# Altium PCB SBH_Charger.PcbDoc (part 1 of 3)
Units mil, origin at the board's own origin, x right, y up, seen from the top; angles counter-clockwise.
Board outline 4700 x 3200 mil, 4 copper layers (Top Layer, Mid Layer 1, Mid Layer 2, Bottom Layer), stack 61.811 mil thick; 160 components, 116 nets, 654 pads, 375 vias.
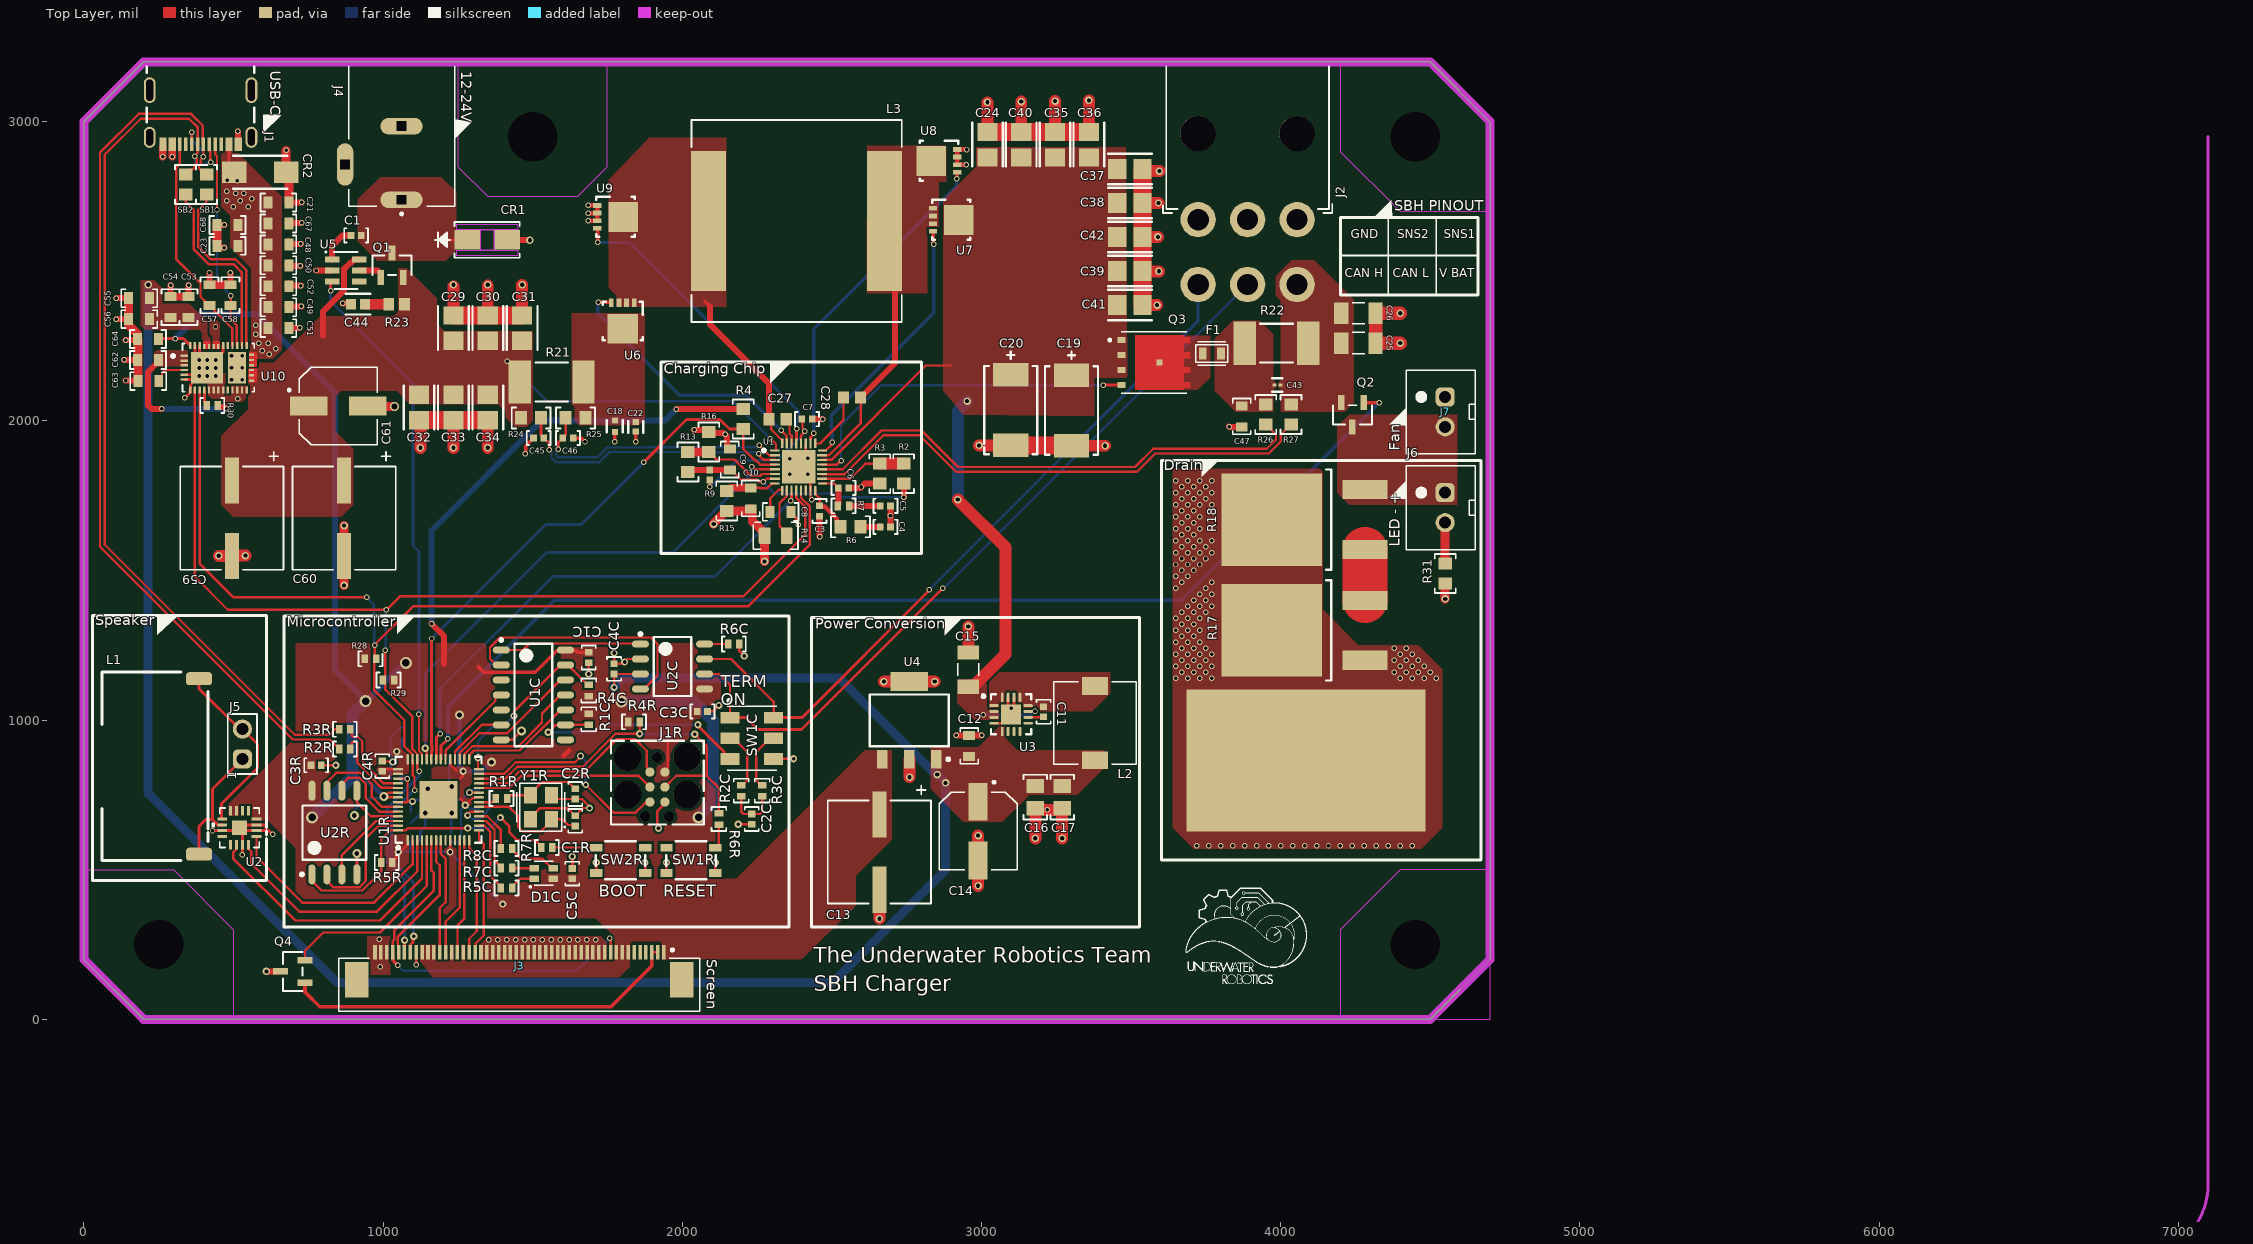
[diagram p0: Top Layer view]
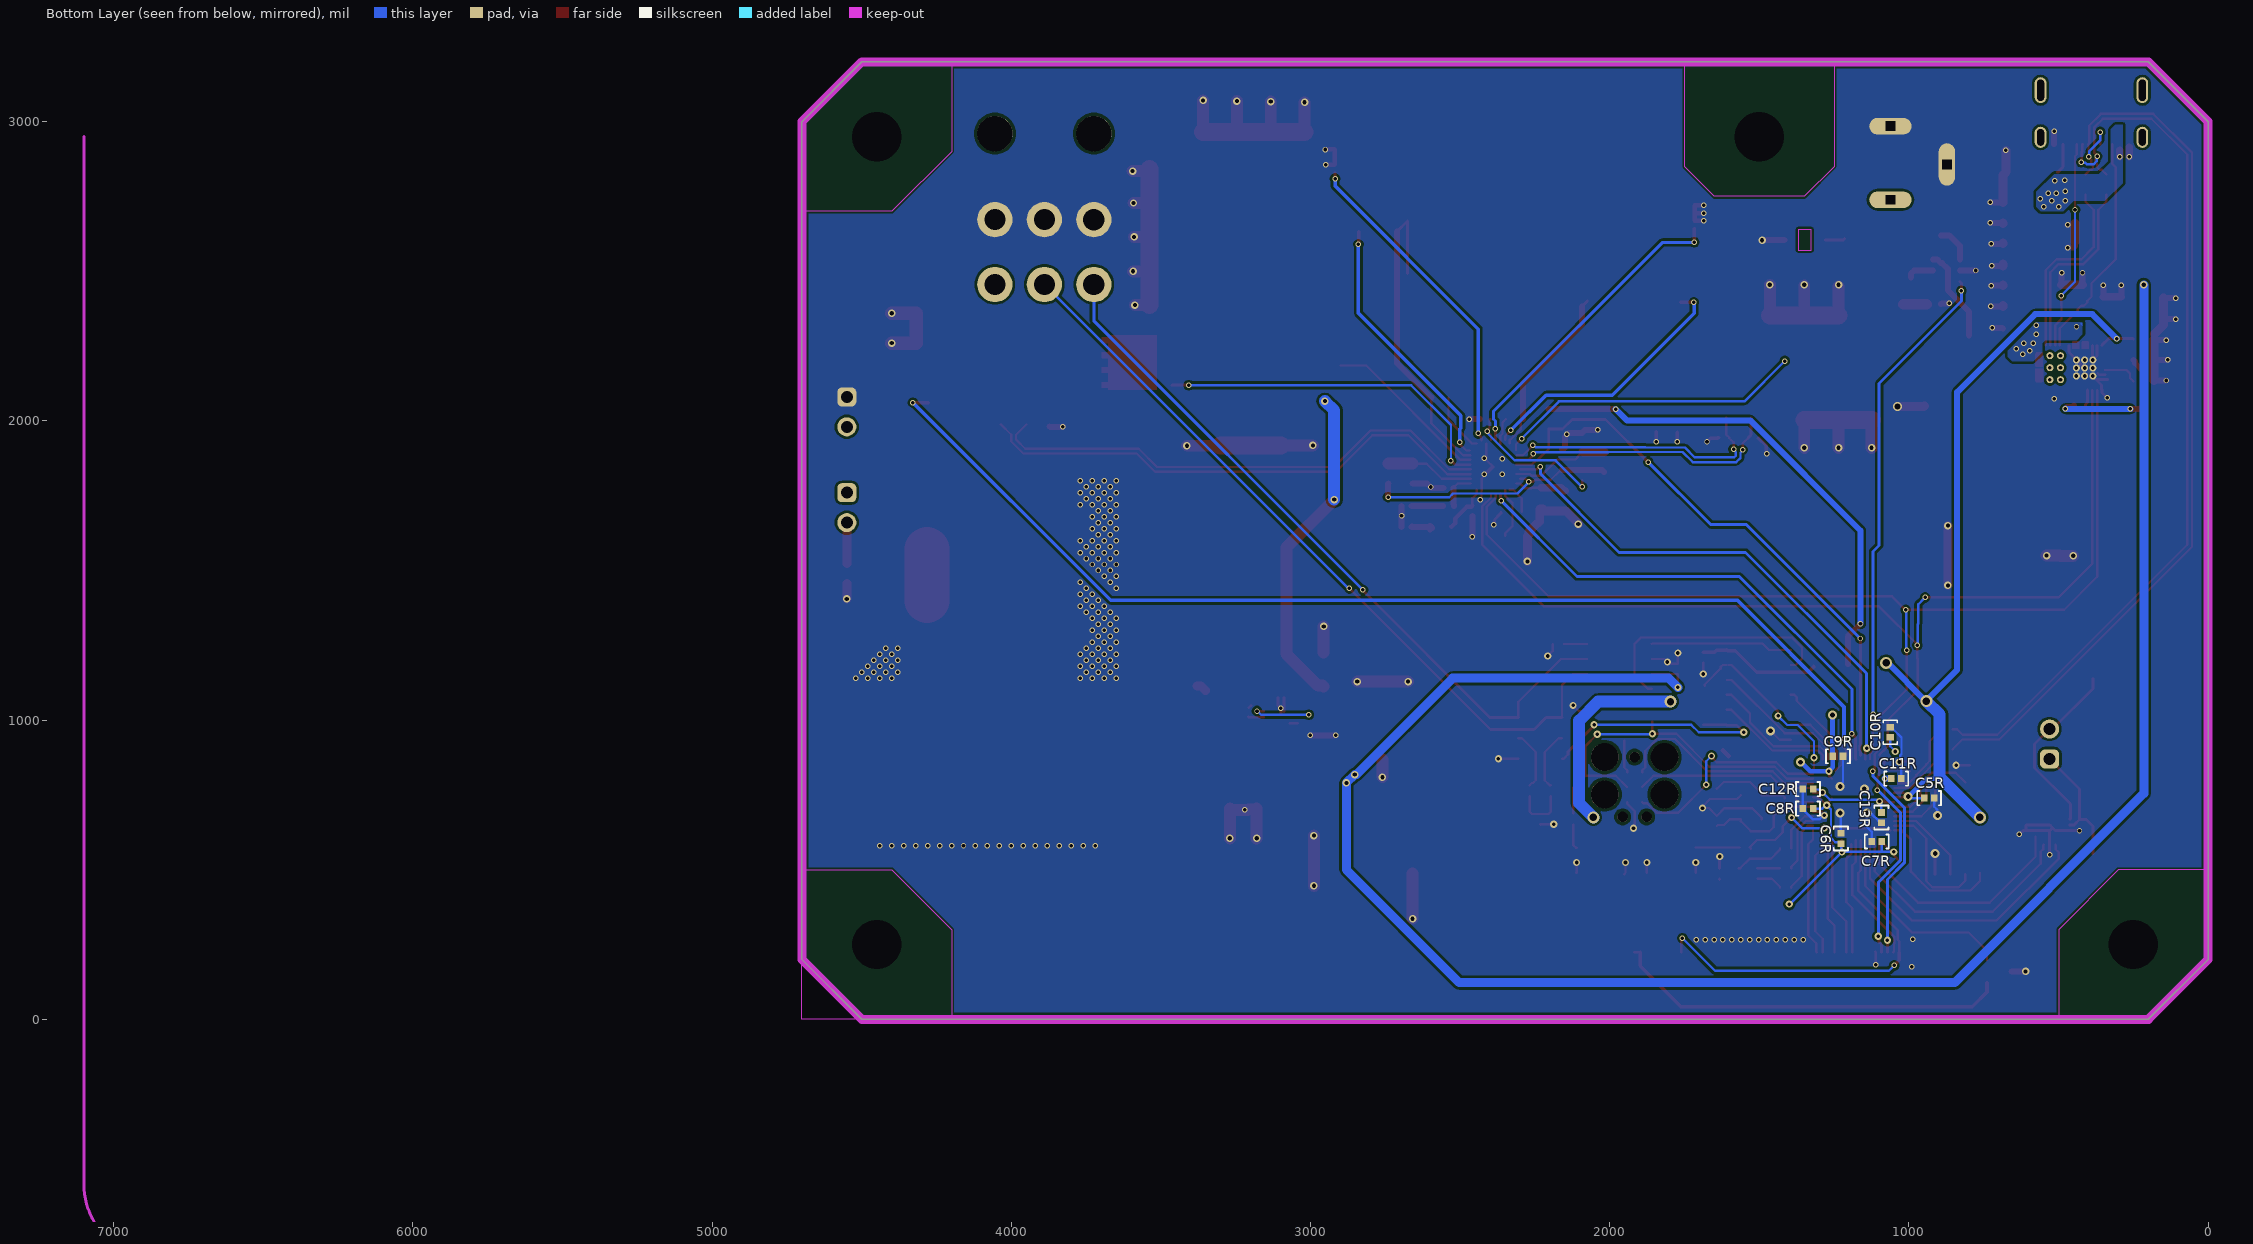
[diagram p1: Bottom Layer view, seen from below]
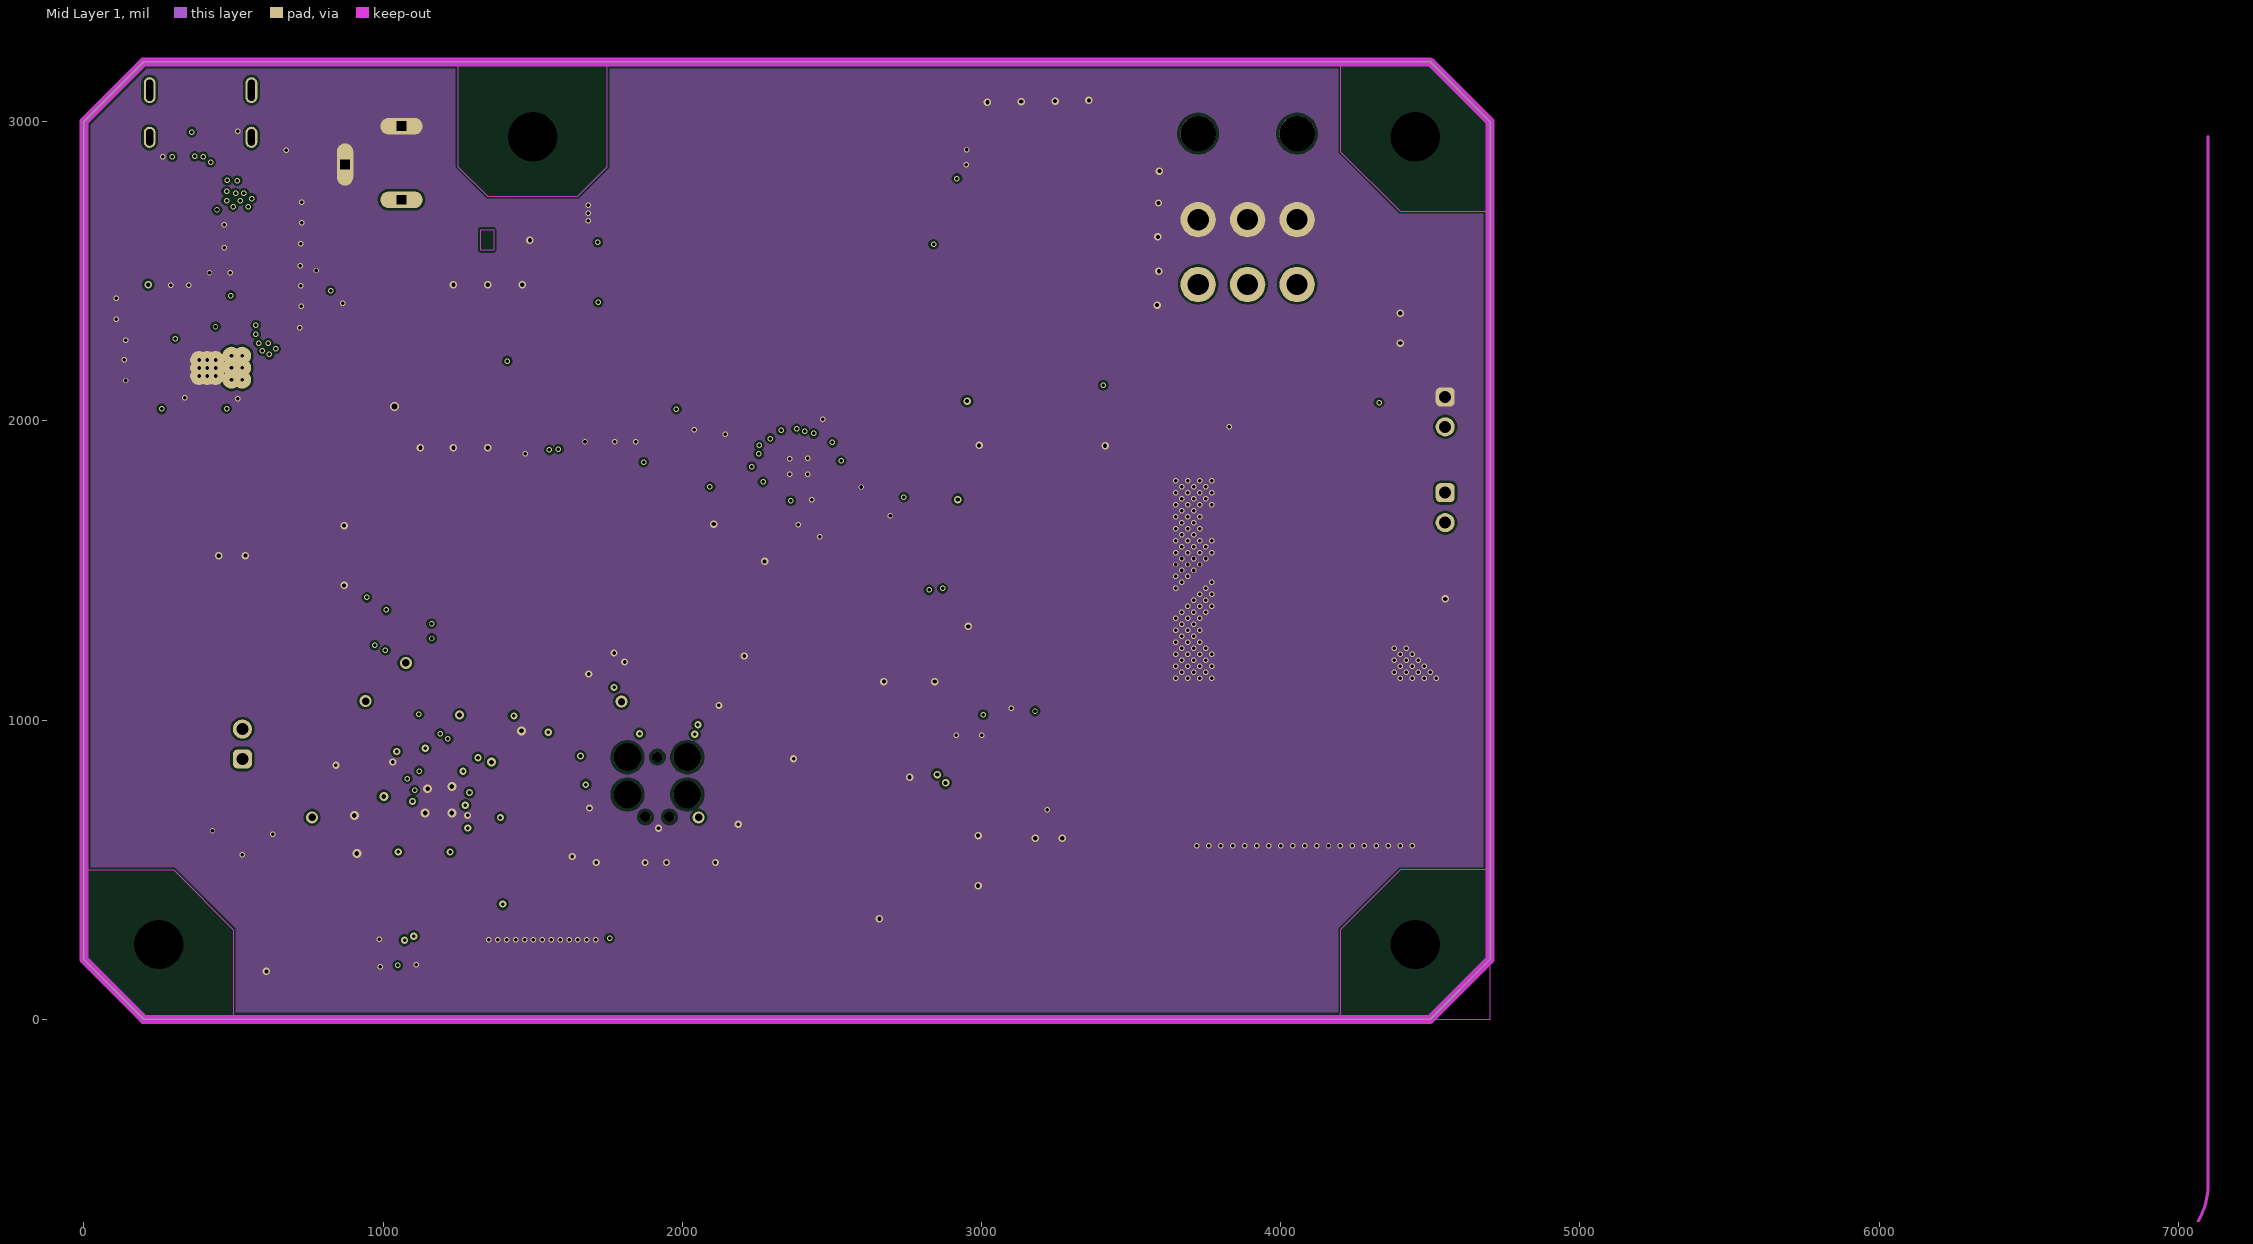
[diagram p2: Mid Layer 1]
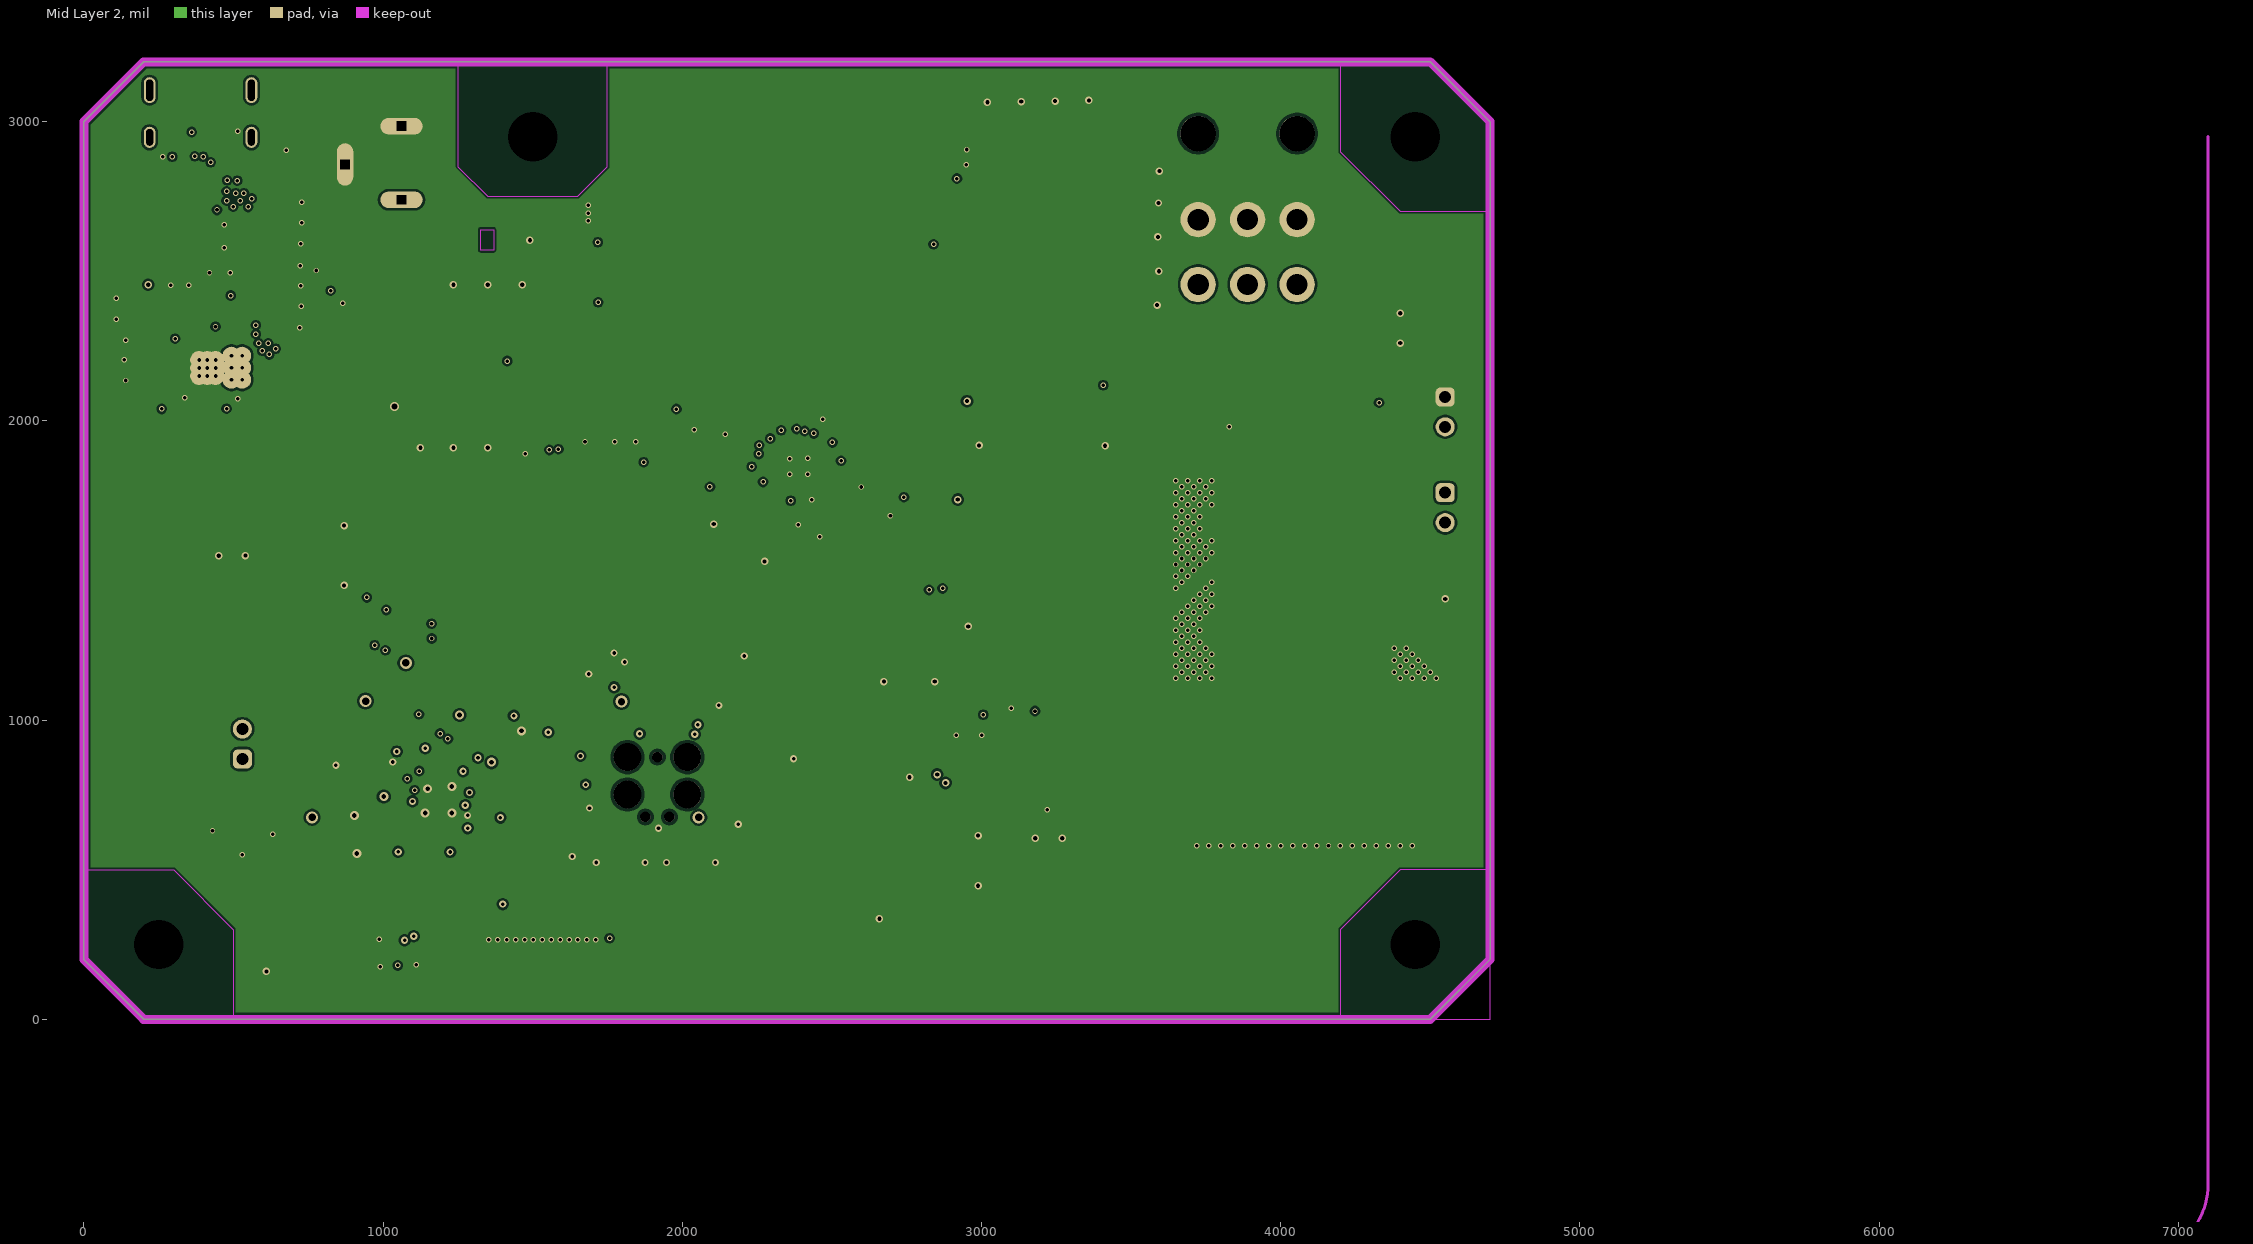
[diagram p3: Mid Layer 2]
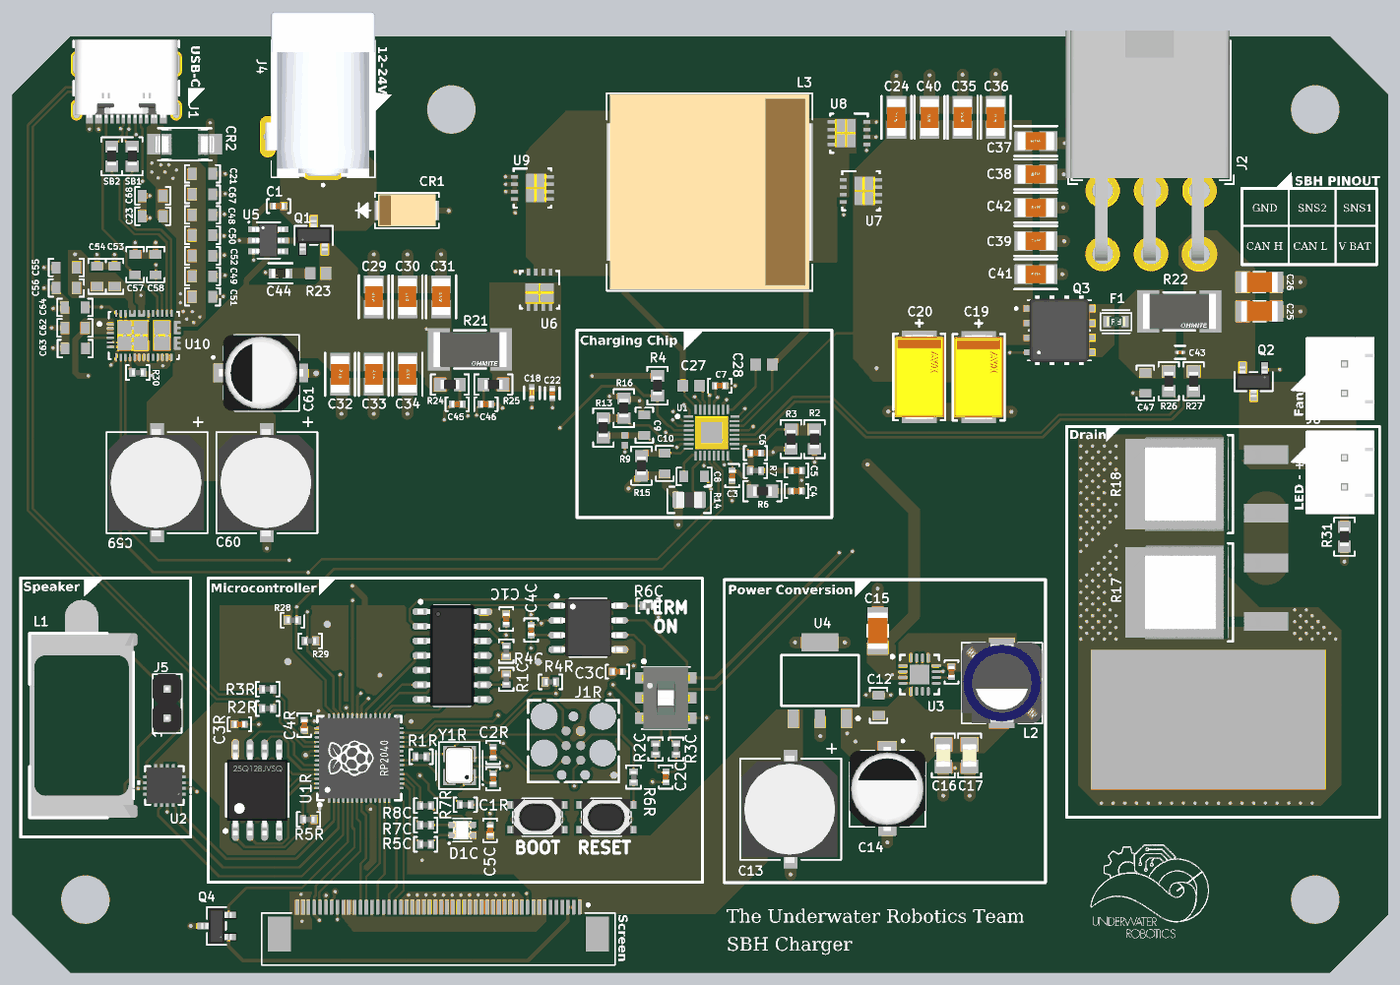
[diagram p5: 3D render of the assembled board from above, using the file's embedded part models]
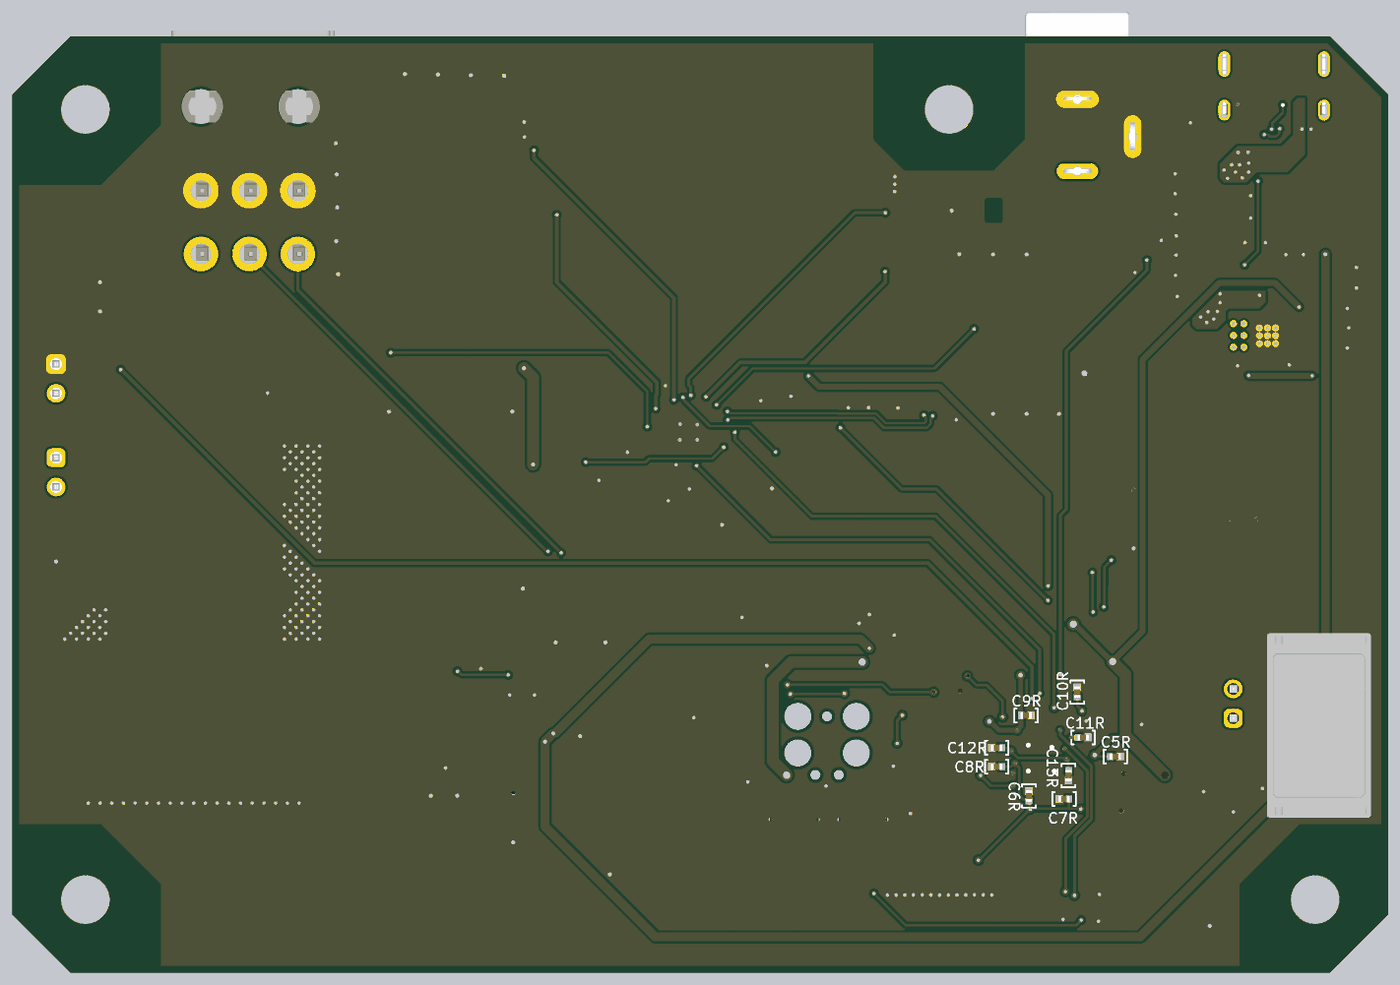
[diagram p6: 3D render of the assembled board from below, using the file's embedded part models]

## Layer stack, top to bottom
Top Solder: solder mask 0.5, Solder Resist, Dk 3.8
Top Layer: signal copper 1.378
Dielectric 1: prepreg 7.874, 7628, Dk 4.6
Mid Layer 1: signal copper 0.689
Core: core 41.929, FR-4, Dk 4.5
Mid Layer 2: signal copper 0.689
Dielectric 2: prepreg 7.874, 7628, Dk 4.6
Bottom Layer: signal copper 1.378
Bottom Solder: solder mask 0.5, Solder Resist, Dk 3.8

## Board outline
4500,3200 4700,3000 4700,200 4500,0 200,0 0,200 0,3000 200,3200

## Design rules (kind name [scope] priority, off if disabled: settings)
AcuteAngle [All] p1: minimum=8.00000000000000E+0001 checktracksonly=FALSE
BoardOutlineClearance "BoardOutlineClearance JLCPCB" [All] p1: gap=11.81 ignorepadtopadclearanceinfootprint=FALSE
Clearance "Clearance JLCPCB 4 layer" [All] p1: gap=7.87 ignorepadtopadclearanceinfootprint=FALSE except(3.54: Arc-Arc Arc-Track Track-Track; 5: Arc-SMDPad Arc-Via Track-SMDPad Track-Via SMDPad-SMDPad; 9.45: THPad-THPad THPad-Via Via-Via; 10: Arc-Hole Track-Hole SMDPad-Hole THPad-Hole Via-Hole Fill-Hole Poly-Hole Region-Hole Text-Hole)
DiffPairsRouting "Diff Pairs USB 2.0" [InDifferentialPairClass('USB 2.0')] p1: maxlimit=5 minlimit=5 mostfreqgap=5 toplayer_minwidth=7.87 toplayer_maxwidth=7.87 toplayer_prefwidth=7.87 midlayer1_minwidth=15 midlayer1_maxwidth=15 midlayer1_prefwidth=15 midlayer2_minwidth=15 midlayer2_maxwidth=15 midlayer2_prefwidth=15 bottomlayer_minwidth=7.87 bottomlayer_maxwidth=7.87 bottomlayer_prefwidth=7.87 impedanceprofiledriven=TRUE impedanceprofileid={9C1C01C3-81FD-4AE1-9E3D-BC841176F5CA} maxuncoupledlength=500
DiffPairsRouting "Diff Pairs PCIe Gen 2" [InDifferentialPairClass('PCIe Gen 2')] p2: maxlimit=5 minlimit=5 mostfreqgap=5 toplayer_minwidth=5.53 toplayer_maxwidth=5.53 toplayer_prefwidth=5.53 midlayer1_minwidth=15 midlayer1_maxwidth=15 midlayer1_prefwidth=15 midlayer2_minwidth=15 midlayer2_maxwidth=15 midlayer2_prefwidth=15 bottomlayer_minwidth=5.53 bottomlayer_maxwidth=5.53 bottomlayer_prefwidth=5.53 impedanceprofiledriven=TRUE impedanceprofileid={D86E5A41-F98B-413D-93FD-A6E48D035561} maxuncoupledlength=500
HoleSize "HoleSize JLCPCB Pad" [IsPad] p1: absolutevalues=TRUE maxlimit=248.03 minlimit=19.68 maxpercent=80.000 minpercent=20.000
HoleSize "HoleSize JLCPCB 4 layer Cheap" [All] p2: absolutevalues=TRUE maxlimit=248.03 minlimit=11.81 maxpercent=80.000 minpercent=20.000
HoleToHoleClearance "HoleToHoleClearance JLCPCB Same Net" [All] p1: gap=10 allowstackedmicrovias=TRUE
MinimumAnnularRing "MinimumAnnularRing JLCPCB Via" [All] p1: minimumring=2.95
MinimumAnnularRing "MinimumAnnularRing JLCPCB Pad" [IsPad] p2: minimumring=9.84
MinimumAnnularRing "MinimumAnnularRing JLCPCB 1oz" [All] p3: minimumring=5.12
MinimumSolderMaskSliver "MinimumSolderMaskSliver JLCPCB" [All] p1: minsoldermaskwidth=3.94
PlaneClearance [All] p1: clearance=11.81
PlaneConnect [All] p1: planeconnectstyle=Direct reliefexpansion=20 reliefentries=4 reliefconductorwidth=10 reliefairgap=10
PolygonConnect [All] p1: connectstyle=Direct reliefconductorwidth=15 reliefentries=4 polygonreliefangle="45 Angle" airgapwidth=10
RoutingVias "RoutingVias JLCPCB 4 layer" [All] p1: holewidth=19.68 width=39.37 viastyle="Through Hole" minholewidth=11.81 minwidth=17.72 maxholewidth=50 maxwidth=80 useviatemplates=TRUE
SilkToSilkClearance [All] p1: silktosilkclearance=3
SilkToSolderMaskClearance "SilkToSolderMaskClearance JLCPCB" [IsPad] p1: minsilkscreentomaskgap=5.91 clearancetoexposedcopper=TRUE
SolderMaskExpansion "SolderMaskExpansion JLCPCB" [All] p1: expansion=1.5 istentingtop=FALSE
UnRoutedNet [All] p1: checkbadconnections=TRUE
Width "Width JLCPCB 4 layer" [All] p1: maxlimit=196.85 minlimit=3.54 preferedwidth=9.84 minimp=50.000000 maximp=50.000000 favimp=50.000000
21 further rules are at their usual default settings.

## Classes and differential pairs
differential pair class "USB 2.0": USB USB_RP2040
component class U_RP2040_with_CAN: C1C C2C C3C C4C C5C D1C R1C R2C R3C R4C R5C R6C R7C R8C SW1C U1C U2C
component class U_RP2040_C: C1R C2R C3R C4R C5R C6R C7R C8R C9R C10R C11R C12R C13R J1R R1R R2R R3R R4R R5R R6R R7R SW1R SW2R U1R U2R Y1R
component class SBH_Charger_Connectors: C21 C23 C67 C68 J1 J2 J3 J4 J6 J7 R31 SB1 SB2
component class Designator: C48 C49 C50 C51 C52 C53 C54 C55 C56 C57 C58 C59 C60 C61 C62 C63 C64 CR2 R30 U10
differential pair D: +D_P -D_N
differential pair SR: +SR_P -SR_N
differential pair AC: +AC_P -AC_N
differential pair USB: +USB_P -USB_N
differential pair USB_RP2040: +USB_RP2040_P -USB_RP2040_N

## Components (designator, comment, footprint, x,y, rotation, side; value= is the part's Value field where it differs from the comment)
C1 "CC0402KRX7R9BB103" CAPACITOR_0402 910,2620 r180 top value="10 nF"
C1C "100nF Ceramic 25V" CAPACITOR_0402 1687.41,1209.12 r270 top value=0.1uF
C1R "27pF Ceramic 50V" CAPACITOR_0402 1642.41,663.23 r90 top value=27pF
C2C "4700pF Ceramic 25V" CAPACITOR_0402 2232.41,669.12 r90 top value=4.7nF
C2R "27pF Ceramic 50V" CAPACITOR_0402 1642.41,753.23 r270 top value=27pF
C3 "15pF Ceramic 50V" CAPACITOR_0402 2459,1698.87 r270 top value=15pF
C3C "100nF Ceramic 25V" CAPACITOR_0402 2067.41,1029.12 r0 top value=0.1uF
C3R "100nF Ceramic 6.3V" CAPACITOR_0402 776.4,849.12 r0 top value=0.1uF
C4 "1200pF Ceramic 50V" CAPACITOR_0402 2679,1646 r0 top value=1200pF
C4C "100nF Ceramic 25V" CAPACITOR_0402 1772.41,1171.25 r90 top value=0.1uF
C4R "1uF Ceramic 16V" CAPACITOR_0402 997.41,846.1 r90 top value=1uF
C5 "3.3nF Ceramic 50V" CAPACITOR_0402 2679,1716 r0 top value=3.3nF
C5C "1uF Ceramic 16V" CAPACITOR_0402 1632.41,486.83 r90 top value=1uF
C5R "100nF Ceramic 6.3V" CAPACITOR_0402 932.41,739.12 r180 bottom value=0.1uF
C6 "33pF Ceramic 50V" CAPACITOR_0402 2539,1776 r0 top value=33pF
C6R "100nF Ceramic 6.3V" CAPACITOR_0402 1227.41,604.12 r90 bottom value=0.1uF
C7 "2.2uF Ceramic 35V" CAPACITOR_0402 2416.87,2006 r180 top value=2.2uF
C7R "100nF Ceramic 6.3V" CAPACITOR_0402 1107.41,594.12 r0 bottom value=0.1uF
C8 "100pF Ceramic 50V" CAPACITOR_0603 2329,1696 r0 top value=100pF
C8R "100nF Ceramic 6.3V" CAPACITOR_0402 1337.41,704.12 r0 bottom value=0.1uF
C9 "1uF Ceramic 16V" CAPACITOR_0603 2159,1871 r90 top value=1uF
C9R "100nF Ceramic 6.3V" CAPACITOR_0402 1237.41,879.12 r180 bottom value=0.1uF
C10 "100pF Ceramic 50V" CAPACITOR_0603 2229,1741 r270 top value=100pF
C10R "100nF Ceramic 6.3V" CAPACITOR_0402 1062.41,959.12 r90 bottom value=0.1uF
C11 "22nF Ceramic 25V" CAPACITOR_0402 3208,1028 r90 top value=22nF
C11R "1uF Ceramic 16V" CAPACITOR_0402 1042.41,804.12 r180 bottom value=1uF
C12 "100nF Ceramic 25V" CAPACITOR_0603 2959,914 r90 top value=0.1uF
C12R "100nF Ceramic 6.3V" CAPACITOR_0402 1337.41,769.12 r0 bottom value=0.1uF
C13 "22uF electrolytic 35 V" PCAP_8x5.4-ELECT_NCA 2659,559 r270 top value=22uF
C13R "100nF Ceramic 6.3V" CAPACITOR_0402 1092.41,674.12 r270 bottom value=0.1uF
C14 "10uF electrolytic 63V" CAP_EEHZC1J100P 2989,629 r270 top value=10uF
C15 "10uF Ceramic 25V" CAPACITOR_1206 2956,1169 r90 top
C16 "22uF Ceramic 10V" CAPACITOR_0805 3180,742.6 r270 top value=22uF
C17 "22uF Ceramic 10V" CAPACITOR_0805 3270,742.6 r270 top value=22uF
C18 "CC0402KRX7R9BB103" FP-CC0402-MFG 1775,1982.05 r270 top value="10 nF"
C19 "TAJD226K035RNJ" FP-TAJD-MFG 3301,2035 r90 top
C20 "TAJD226K035RNJ" FP-TAJD-MFG 3098,2036 r90 top
C21 "CL10B103KB8NNNC" CAPACITOR_0603 650,2730 r180 top value=0.01uF
C22 "C0402C102J5GACTU" FP-C0402-BB-MFG 1844.46,1980 r270 top value="1,000 pF"
C23 "CL10B103KB8NNNC" CAPACITOR_0603 480,2585 r0 top value=0.01uF
C24 "C3216X7R1V106M160AC" FP-C3216-160-0_2-IPC_C 3020,2923 r90 top
C25 "10uF Ceramic 25V" CAPACITOR_1206 4260,2260 r0 top
C26 "10uF Ceramic 25V" CAPACITOR_1206 4260,2360 r0 top
C27 "GRM188R71H473KA61D" CAPC1608X90X35ML10T15 2319,2006 r180 top
C28 "GRM188R71H473KA61D" CAPC1608X90X35ML10T15 2567.54,2078 r0 top
C29 "C3216X7R1V106M160AC" FP-C3216-160-0_2-IPC_C 1235,2310 r90 top
C30 "C3216X7R1V106M160AC" FP-C3216-160-0_2-IPC_C 1350,2310 r90 top
C31 "C3216X7R1V106M160AC" FP-C3216-160-0_2-IPC_C 1465,2310 r90 top
C32 "C3216X7R1V106M160AC" FP-C3216-160-0_2-IPC_C 1120,2045 r270 top
C33 "C3216X7R1V106M160AC" FP-C3216-160-0_2-IPC_C 1235,2045 r270 top
C34 "C3216X7R1V106M160AC" FP-C3216-160-0_2-IPC_C 1350,2045 r270 top
C35 "C3216X7R1V106M160AC" FP-C3216-160-0_2-IPC_C 3246,2923 r90 top
C36 "C3216X7R1V106M160AC" FP-C3216-160-0_2-IPC_C 3359,2923 r90 top
C37 "C3216X7R1V106M160AC" FP-C3216-160-0_2-IPC_C 3496,2842 r0 top
C38 "C3216X7R1V106M160AC" FP-C3216-160-0_2-IPC_C 3496,2728.25 r0 top
C39 "C3216X7R1V106M160AC" FP-C3216-160-0_2-IPC_C 3496,2500.75 r0 top
C40 "C3216X7R1V106M160AC" FP-C3216-160-0_2-IPC_C 3133,2923 r90 top
C41 "C3216X7R1V106M160AC" FP-C3216-160-0_2-IPC_C 3496,2387 r0 top
C42 "C3216X7R1V106M160AC" FP-C3216-160-0_2-IPC_C 3496,2614.5 r0 top
C43 "GRM033R6YA104ME14D" FP-GRM033-0_03-IPC_C 3989,2120 r180 top
C44 "UMK107AB7105KA-T" FP-0603-L_1_6_0_15-W_0_8-IPC_C 916.29,2390 r180 top
C45 "22nF Ceramic 25V" CAPACITOR_0402 1520,1943 r180 top value=22nF
C46 "22nF Ceramic 25V" CAPACITOR_0402 1618,1943 r0 top value=22nF
C47 "1uF Ceramic 16V" CAPACITOR_0603 3870,2015 r90 top value=1uF
C48 "4.7uF Ceramic 6.3V" CAPACITOR_0603 650,2590 r0 top value=4.7uF
C49 "10nF Ceramic 6.3V" CAPACITOR_0603 650,2380 r0 top value=0.01uF
C50 "10nF Ceramic 6.3V" CAPACITOR_0603 650,2520 r0 top value=0.01uF
C51 "10nF Ceramic 6.3V" CAPACITOR_0603 650,2310 r0 top value=0.01uF
C52 "10nF Ceramic 6.3V" CAPACITOR_0603 650,2450 r0 top value=0.01uF
C53 "100uF Ceramic 6.3V" CAPACITOR_0603 350,2380 r90 top
C54 "100uF Ceramic 6.3V" CAPACITOR_0603 290,2380 r90 top
C55 "100uF Ceramic 6.3V" CAPACITOR_0603 185,2410 r180 top
C56 "10uF Ceramic 6.3V" CAPACITOR_0603 185,2340 r180 top
C57 "330pF Ceramic 16V" CAPACITOR_0603 420,2420 r90 top value=330pF
C58 "330pF Ceramic 16V" CAPACITOR_0603 490,2420 r90 top value=330pF
C59 "22uF electrolytic 35 V" PCAP_8x5.4-ELECT_NCA 495,1675 r270 top value=22uF
C60 "22uF electrolytic 35 V" PCAP_8x5.4-ELECT_NCA 870,1675 r270 top value=22uF
C61 "10uF electrolytic 63V" CAP_EEHZC1J100P 850,2050 r0 top value=10uF
C62 "10uF Ceramic 6.3V" CAPACITOR_0603 214.65,2203.54 r180 top
C63 "10uF Ceramic 6.3V" CAPACITOR_0603 215.35,2132.83 r180 top
C64 "10uF Ceramic 6.3V" CAPACITOR_0603 214.65,2273.54 r180 top
C67 "CL10B103KB8NNNC" CAPACITOR_0603 650,2660 r0 top value=0.01uF
C68 "CL10B103KB8NNNC" CAPACITOR_0603 480,2655 r180 top value=0.01uF
CR1 "SMAJ26CA" SMASeries_LTF 1348,2605 r0 top
CR2 "SMAJ22CA" FP-SMAJ-CA-MFG 589.61,2831 r0 top
D1C "EAST1616RGBB4" LED_0606_4SMD 1537.41,487.42 r0 top
F1 "Fuse 5A 32V 0603" "2-SMD Fuse 0603" 3770,2225 r0 top
J1 "217179-0001" CONN_USBC_FP-217179-0001-MFG 390,3060 r180 top
J1R "TagConnect SWD" TC2030-MCP 1916.91,876.25 r270 top
J2 "Mini-Fit Jr R/A" "CONN_MOLEX_MINIFIT JR_6 POS_R/A" 4055,2960 r180 top
J3 "FFC_50POS_0.5MM_HORIZ_TOP" EASTRISING_ER-CON50HT-1 1455.38,224 r180 top
J4 "54-00166" TENSILITY_54-00166 1062,2985.06 r180 top
J5 "HEADER VERT 2.54MM" HEADER_2PIN_2.54MM 530,870 r90 top
J6 "XH2.54 VERT" CONN_JST_XH254_2POS_VERT 4550,1760 r270 top
J7 "XH2.54 VERT" CONN_JST_XH254_2POS_VERT 4550,2080 r270 top
L1 "SPEAKER_SP_1609S" SPEAKER_SP-1609S 60,1160 r0 top
L2 "4.7uH Shielded Drum Core" INDUCTOR_SLF7045 3380,990 r90 top value=4.7uH
L3 "SRP1770TA-3R3M" INDUCTOR_SRP1770TA-3R3M_BRN 2382,2668 r180 top
Q1 "DMP3056L-7" SOT-23-3#1 1030,2520 r0 top
Q2 "DMP3056L-7" SOT-23-3#1 4240,2020 r180 top
Q3 "AON6407" TRANS_AON6407 3576.46,2195 r0 top
Q4 "MOSFET N-CH 30V 5.8A SOT-23-3" SOT-23-3#2 698,160 r270 top
R1C "10k Ohm 1% 1/16W" RESISTOR_0402 1687.41,1002.82 r270 top
R1R "1k Ohm 1% 1/16W" RESISTOR_0402 1396.11,738.23 r0 top
R2 "1k Ohm 5% 1/8W" RESISTOR_0603 2740,1823.5 r90 top
R2C "60.4 Ohm 1% 1/16W" RESISTOR_0402 2197.41,764.12 r270 top
R2R "27 Ohm 1% 1/16W" RESISTOR_0402 872.41,903.11 r0 top
R3 "100k Ohm 5% 1/8W" RESISTOR_0603 2660,1823.5 r270 top
R3C "60.4 Ohm 1% 1/16W" RESISTOR_0402 2267.41,764.12 r270 top
R3R "27 Ohm 1% 1/16W" RESISTOR_0402 872.41,969.12 r0 top
R4 "10k Ohm 5% 1/10W" RESISTOR_0603 2204,2006 r270 top
R4C "10k Ohm 1% 1/16W" RESISTOR_0402 1687.41,1099.12 r90 top
R4R "10k Ohm 1% 1/16W" RESISTOR_0402 1838.71,994.12 r0 top
R5C "604 Ohm 1% 1/16W" RESISTOR_0402 1412.41,439.12 r0 top
R5R "10k Ohm 1% 1/16W" RESISTOR_0402 1012.41,524.12 r180 top
R6 "15k Ohm 5% 1/10W" RESISTOR_0603 2562.5,1646 r0 top
R6C "10k Ohm 1% 1/16W" RESISTOR_0402 2172.41,1254.12 r0 top
R6R "1k Ohm 1% 1/16W" RESISTOR_0402 2122.41,669.12 r90 top
R7 "16.9k Ohm 1% 1/16W" RESISTOR_0402 2539,1716 r0 top
R7C "200 Ohm 1% 1/16W" RESISTOR_0402 1412.41,505.13 r0 top
R7R "1k Ohm 1% 1/16W" RESISTOR_0402 1547.41,574.12 r180 top
R8C "200 Ohm 1% 1/16W" RESISTOR_0402 1412.41,571.14 r0 top
R9 "CRCW040210R0FKEDHP" RESC1005X40X25NL05T10 2092.5,1819.27 r90 top
R13 "470k Ohm 5% 1/10W" RESISTOR_0603 2019,1862.5 r90 top
R14 "33k Ohm 5% 1/8W" RESISTOR_0805 2312.19,1616 r180 top
R15 "169K OHM 1% 1/3W" RESISTOR_0603 2149,1732.5 r270 top
R16 "270k Ohm 1% 1/10W" RESISTOR_0603 2089,1929.5 r90 top
R17 "PWR163S-25-10R0JE" FP-PWR163-MFG 4080,1300 r90 top
R18 "PWR163S-25-10R0JE" FP-PWR163-MFG 4080,1670 r90 top
R21 "PCS2512DR0100ET" FP-PCS2512-MFG 1563.7,2130 r0 top value=10mΩ
R22 "PCS2512DR0100ET" FP-PCS2512-MFG 3986.3,2260 r0 top value=10mΩ
R23 "CRCW06032R20FKEA" RESC1609X50X30ML10T20 1045,2390 r0 top
R24 "4.7 Ohm 5% 1/8W" RESISTOR_0603 1495,2010 r0 top
R25 "4.7 Ohm 5% 1/8W" RESISTOR_0603 1643.5,2010 r180 top
R26 "27 Ohm 5% 1/8W" RESISTOR_0603 3950,2021.5 r270 top
R27 "27 Ohm 5% 1/8W" RESISTOR_0603 4035,2021.5 r270 top
R28 "2.2k Ohm 1% 1/16W" RESISTOR_0402 957.89,1205 r0 top
R29 "2.2k Ohm 1% 1/16W" RESISTOR_0402 1018,1134 r180 top
R30 "10k Ohm 1% 1/16W" RESISTOR_0402 429,2051.21 r0 top
R31 "2.1k Ohm 5% 1/8W" RESISTOR_0603 4550,1490 r270 top
SB1 "0 Ohm Jumper No Fit" RESISTOR_0603 410,2790 r90 top
SB2 "0 Ohm Jumper No Fit" RESISTOR_0603 340,2790 r90 top
SW1C "Switch DPDT" CAS-220TA 2232.41,939.12 r270 top
SW1R "434123025826" SMD_434123025826 2029.1,531.45 r0 top
SW2R "434123025826" SMD_434123025826 1794.1,531.45 r0 top
U1 "BQ25730RSNR" RSN0032B-IPC_B 2389,1846 r0 top
U1C "MCP2517FD" SOIC-14 1502.41,1084.12 r0 top
U1R "RP2040" "QFN-56 RP2040" 1185.28,733.62 r90 top locked
U2 "MAX98357AETE+T" TQFN-16 520,640 r180 top
U2C "CAN Transceiver" SOIC-8 1967.41,1179.12 r0 top
U2R "W25Q128JVSIQ" "SOIC-8 W25QxJV" 837.27,624.12 r90 top
U3 "REG BUCK 5V 1A" "QFN-16 (3x3)" 3099,1019 r0 top
U4 "TLE42744GS V33" INF-PG-SOT223_SC-73_N 2759,998.92 r90 top
U5 "LTC4412ES6TRPBF" TSOT-23_S6 875,2502.6 r0 top
U6 "G30N03D3" DNH0008A_NV#1 1801.2,2333.98 r270 top
U7 "G30N03D3" DNH0008A_NV#1 2899,2672 r0 top
U8 "G30N03D3" DNH0008A_NV#2 2858,2869 r180 top
U9 "G30N03D3" DNH0008A_NV#1 1777.02,2681.8 r0 top
U10 "TPS25750DRJKR" "38-WQFN (4x6)" 449.78,2177.8 r0 top
Y1R "CRYSTAL 12.0000MHZ 18PF SMD" "4-SMD, NO LEAD CRYSTAL 3.2x2.5mm" 1562.41,668.23 r90 top

## Footprints (in the part's own frame and the unit in brackets; to place one, negate y for a bottom-side part, rotate by r counter-clockwise, add the part's x,y. Pads: shape width x height; smd on the part's side, far side on the other; paste and mask are expansions set on the pad)
"2-SMD Fuse 0603" [mm] "0603 Fuse Footprint"
  rect 0.65x1 smd paste+0 mask+0: 1(-0.775,0) 2(0.775,0)
  silkscreen extent -1.35,-1 1.35,1, body extent -0.8,-0.4 0.8,0.4, height 0.64
"4-SMD, NO LEAD CRYSTAL 3.2x2.5mm" [mm]
  rrect0% 1.4x1.1 smd: 1(0,0) 2(2.032,0) 3(2.032,1.778) 4(0,1.778)
  silkscreen extent -1.02,-1.2 3.05,2.92, body extent -0.58,-0.36 2.62,2.14, height 0.82
"38-WQFN (4x6)" [mm] "TPS25750DRJKR"
  rect 0.6x0.2 smd paste+0 mask-0.292: 1(-2.9,1) 2(-2.9,0.6) 3(-2.9,0.2) 4(-2.9,-0.2) 5(-2.9,-0.6) 6(-2.9,-1)
  rect 0.2x0.6 smd paste+0 mask-0.292: 7(-2.4,-1.9) 8(-2,-1.9) 9(-1.6,-1.9) 10(-1.2,-1.9) 11(-0.8,-1.9) 12(-0.4,-1.9) 13(0,-1.9) 14(0.4,-1.9) 15(0.8,-1.9) 16(1.2,-1.9) 17(1.6,-1.9) 18(2,-1.9) 19(2.4,-1.9) 26(2.4,1.9) 27(2,1.9) 28(1.6,1.9) 29(1.2,1.9) 30(0.8,1.9) 31(0.4,1.9) 36(-1.6,1.9) 37(-2,1.9) 38(-2.4,1.9)
  rect 0.4x0.2 smd paste-0.187 mask-0.191: 20(2.8,-1.1) 21(2.8,-0.65) 22(2.8,-0.2) 23(2.8,0.2) 24(2.8,0.65) 25(2.8,1.1)
  rect 0.2x0.4 smd paste-0.187 mask-0.191: 32(0,1.8) 33(-0.4,1.8) 34(-0.8,1.8) 35(-1.2,1.8)
  rect 2.72x2.65 smd paste-1.347 mask-1.346: 39(-0.965,0)
  rect 1.53x2.65 smd paste-1.312 mask-1.308: 40(1.56,0)
  round 0.6 / inner round 1.524 / far side round 0.6 hole 0.305 paste-2539.97 mask+0: 45(-1.64,0.655) 46(-0.94,0.655) 47(-0.24,0.655) 49(-1.64,-0.025) 50(-0.94,-0.025) 51(-0.24,-0.025) 53(-1.64,-0.705) 54(-0.94,-0.705) 55(-0.24,-0.705) 59(2.01,0) 60(1.11,0) 61(1.11,1.02) 62(2.01,1.02) 63(1.11,-1.02) 64(2.01,-1.02)
  Top Layer region: -0.5,1.6 -0.5,2.2 -0.45,2.25 0.05,2.25 0.1,2.2 0.1,1.6
  Top Layer region: -1.3,1.6 -1.3,2.2 -1.25,2.25 -0.75,2.25 -0.7,2.2 -0.7,1.6
  Top Layer region: 2.591,-1.191 2.591,-0.097 3.25,-0.097 3.25,-1.15 3.15,-1.25 2.65,-1.25
  Top Layer region: 2.597,0.096 2.597,1.25 2.65,1.303 3.15,1.303 3.25,1.203 3.25,0.15 3.196,0.096 2.901,0.096
  silkscreen extent -3.97,-2.05 3.05,2.05
CAP_EEHZC1J100P [mm]
  rect 3.2x1.6 smd: 1(-2.5,0) 2(2.5,0)
  silkscreen extent -4.25,-3.3 3.3,3.3, body extent -3.65,-3.3 3.65,3.3, height 5.8
CAPACITOR_0402 [mm]
  rect 0.56x0.6 smd: 1(-0.435,0) 2(0.435,0)
  silkscreen extent -1.02,-0.6 1.02,0.6, body extent -0.5,-0.28 0.5,0.27, height 0.51
CAPACITOR_0603 [mil] "CAPACITOR 0603"
  rect 30x40 smd: 1(-35,0) 2(35,0)
  silkscreen extent -60,-30 60,30, body extent -31,-16 32,16, height 31
CAPACITOR_0805 [mm] "CAPACITOR 0805"
  rect 1.2x1.5 smd: 1(-0.95,0) 2(0.95,0)
  silkscreen extent -1.91,-1 1.9,1, body extent -1,-0.62 1,0.63, height 1.26
CAPACITOR_1206 [mm]
  rect 1.2x1.82 smd: 1(-1.46,0) 2(1.46,0)
  silkscreen extent -0.54,-0.9 0.54,0.9, body extent -1.6,-0.9 1.6,0.9, height 1.61
CAPC1608X90X35ML10T15 [mm] "Chip Capacitor, 2-Leads, Body 1.60x0.80mm, IPC Low Density"
  rect 0.95x1.05 smd: 1(-0.725,0) 2(0.725,0)
  body extent -0.85,-0.45 0.85,0.45, height 0.9
CAS-220TA [mm] "SWITCH SLIDE DPDT 100MA 6V"
  rrect0% 1x1.6 smd: 1(-1.75,-1.85) 2(0,-1.85) 3(1.75,-1.85) 4(-1.75,1.85) 5(0,1.85) 6(1.75,1.85)
  silkscreen extent -3.3,-2.1 2.7,2.1, body extent -2.7,-2.1 2.7,2.1, height 2.51
CONN_JST_XH254_2POS_VERT [mm] "JST XH 2.54mm Pitch 2 Pos Vertical"
  rrect50% 1.62x1.62 hole 1.02: 1(0,0)
  round 1.62 hole 1.02: 2(2.54,0)
  silkscreen extent -2.29,-3.3 4.83,2.54, body extent -2.34,-3.35 4.88,2.49, height 7.21
"CONN_MOLEX_MINIFIT JR_6 POS_R/A" [mm] "Molex Minifit Jr 5569 6 Pos R/A"
  round 3 hole 1.801: 1(8.4,7.3) 4(8.4,12.8)
  round 3 hole 1.8: 2(4.2,7.3) 3(0,7.3) 5(4.2,12.8) 6(0,12.8)
  round 3 hole 3 unplated mask+0: ""(0,0) ""(8.4,0)
  silkscreen extent -2.98,-5.72 11.38,6.73, body extent -2.58,-6.6 11.62,13.33, height 11.4
CONN_USBC_FP-217179-0001-MFG [mm] "USB-C (USB TYPE-C) USB 2.0 Receptacle Connector 24 (16+8 Dummy) Position Surface Mount, Right Angle; Through Hole"
  rrect100% 1x1.8 hole 1.4 slot 0.6 at 0 deg paste-2539.97 mask+0: 1(-4.32,2.85) 2(4.32,2.85)
  rrect100% 1x2.2 hole 1.8 slot 0.6 at 0 deg paste-2539.97 mask+0: 3(-4.32,-1.15) 4(4.32,-1.15)
  rect 0.6x1.15 smd paste+0 mask+0: A1-B12(-3.2,3.425) A4-B9(-2.4,3.425) B1-A12(3.2,3.425) B4-A9(2.4,3.425)
  rect 0.3x1.15 smd paste+0 mask+0: A5(-1.25,3.425) A6(-0.25,3.425) A7(0.25,3.425) A8(1.25,3.425) B5(1.75,3.425) B6(0.75,3.425) B7(-0.75,3.425) B8(-1.75,3.425)
  silkscreen extent -4.57,-3.16 4.57,1.58, body extent -4.92,-3.45 4.92,4.1, height 0.25
DNH0008A_NV#1 [mm]
  rect 0.7x0.4 smd paste-0.05 mask-0.051: 1(-1.55,0.975) 2(-1.55,0.325) 3(-1.55,-0.325) 4(-1.55,-0.975) 5(1.55,-0.975) 6(1.55,-0.325) 7(1.55,0.325) 8(1.55,0.975)
  rect 2.51x2.55 smd paste-1.262 mask-1.257: 9(0.645,0)
  silkscreen extent -1.62,-1.7 1.62,1.7, body extent 0,0 0.25,0.25, height 0.25
DNH0008A_NV#2 [mm]
  rect 0.7x0.4 smd paste-0.05 mask-0.051: 1(-1.55,-0.975) 2(-1.55,-0.325) 3(-1.55,0.325) 4(-1.55,0.975) 5(1.55,0.975) 6(1.55,0.325) 7(1.55,-0.325) 8(1.55,-0.975)
  rect 2.51x2.55 smd paste-1.262 mask-1.257: 9(0.645,0)
  silkscreen extent -1.62,-1.7 1.62,1.7, body extent 0,-0.25 0.25,0, height 0.25
EASTRISING_ER-CON50HT-1 [mm]
  rect 0.3x1.25 smd: 1(-12.25,0) 2(-11.75,0) 3(-11.25,0) 4(-10.75,0) 5(-10.25,0) 6(-9.75,0) 7(-9.25,0) 8(-8.75,0) 9(-8.25,0) 10(-7.75,0) 11(-7.25,0) 12(-6.75,0) 13(-6.25,0) 14(-5.75,0) 15(-5.25,0) 16(-4.75,0) 17(-4.25,0) 18(-3.75,0) 19(-3.25,0) 20(-2.75,0) 21(-2.25,0) 22(-1.75,0) 23(-1.25,0) 24(-0.75,0) 25(-0.25,0) 26(0.25,0) 27(0.75,0) 28(1.25,0) 29(1.75,0) 30(2.25,0) 31(2.75,0) 32(3.25,0) 33(3.75,0) 34(4.25,0) 35(4.75,0) 36(5.25,0) 37(5.75,0) 38(6.25,0) 39(6.75,0) 40(7.25,0) 41(7.75,0) 42(8.25,0) 43(8.75,0) 44(9.25,0) 45(9.75,0) 46(10.25,0) 47(10.75,0) 48(11.25,0) 49(11.75,0) 50(12.25,0)
  rect 2x3 smd: S1(-13.79,2.325) S2(13.79,2.325)
  silkscreen extent -15.33,-0.3 15.33,5
FP-0603-L_1_6_0_15-W_0_8-IPC_C [mil]
  rect 33.77x33.94 smd paste+0 mask+0: 1(-23.71,0) 2(23.71,0)
  silkscreen extent -41,-34 41,34, body extent -45,-23 45,23, height 10
FP-C0402-BB-MFG [mm]
  rect 0.52x0.52 smd paste+0 mask+0: 1(-0.4,0) 2(0.4,0)
  silkscreen extent -0.5,-0.64 0.5,0.64, body extent -0.8,-0.4 0.8,0.4, height 0.25
FP-C3216-160-0_2-IPC_C [mil]
  rect 61.18x67.17 smd paste+0 mask+0: 1(-42.37,0) 2(42.37,0)
  silkscreen extent -73,-51 73,51, body extent -77,-39 77,39, height 10
FP-CC0402-MFG [mm]
  rect 0.5x0.5 smd paste+0 mask+0: 1(-0.5,0) 2(0.5,0)
  silkscreen extent -0.53,-0.68 0.53,0.67, body extent -0.87,-0.48 0.87,0.48, height 0.25
FP-GRM033-0_03-IPC_C [mil]
  rect 13.94x10.34 smd paste+0 mask+0: 1(-10.01,0) 2(10.01,0)
  silkscreen extent -17,-22 17,22, body extent -21,-10 21,10, height 10
FP-PCS2512-MFG [mm]
  rect 1.9x3.68 smd paste+0 mask+0: 1(-2.7,0) 2(2.7,0)
  silkscreen extent -1.38,-1.65 1.38,1.65, body extent -3.75,-1.94 3.75,1.94, height 0.25
FP-PWR163-MFG [mm]
  rect 1.62x3.81 smd paste+0 mask+0: 1(-2.54,-5.145) 2(2.54,-5.145)
  rect 7.87x8.51 smd paste+0 mask+0: 3(0,2.795)
  silkscreen extent -4.26,-2.26 4.26,-1.84, body extent -4.36,-7.15 4.36,7.15, height 0.25
FP-SMAJ-CA-MFG [mm]
  rect 2.1x1.8 smd paste+0 mask+0: 1(-2.2,0) 2(2.2,0)
  silkscreen extent -2.3,-1.4 2.3,1.4, body extent -3.35,-1.5 3.35,1.5, height 0.25
FP-TAJD-MFG [mm]
  rect 2x3 smd paste+0 mask+0: 1(-3,0) 2(3,0)
  silkscreen extent -3.75,-2.25 4.97,2.25, body extent -4.1,-2.35 4.1,2.35, height 0.25
HEADER_2PIN_2.54MM [mm]
  rrect50% 1.62x1.62 hole 1.02: 1(0,0)
  round 1.62 hole 1.02: 2(2.54,0)
  silkscreen extent -1.27,-1.25 3.81,1.25, body extent -1.27,-1.25 3.81,1.29, height 8.39
INDUCTOR_SLF7045 [mm]
  rect 1.5x2.2 smd: 1(-3.15,0) 2(3.15,0)
  silkscreen extent -3.5,-3.5 3.5,3.5, body extent -3.5,-3.5 3.5,3.5, height 4.8
INDUCTOR_SRP1770TA-3R3M_BRN [mil]
  rect 117x469 smd paste+0 mask+0: 1(-293.96,0) 2(293.96,0)
  silkscreen extent -351,-338 351,338, body extent -346,-333 346,333, height 266
INF-PG-SOT223_SC-73_N [mm] "SOT223, 4-Leads, Body 6.5x3.5mm, Pitch 2.3mm, IPC Medium Density"
  rect 1.6x0.9 smd: 1(-3.3,-2.3) 2(-3.3,0) 3(-3.3,2.3)
  rect 1.6x3.2 smd: 4(3.3,0)
  silkscreen extent -3.42,-3.43 2.2,3.35, body extent -1.85,-3.35 1.85,3.35, height 1.8
LED_0606_4SMD [mm]
  rrect0% 0.8x0.55 smd: 1(-0.8,-0.45) 2(-0.8,0.45) 3(0.8,0.45) 4(0.8,-0.45)
  silkscreen extent -1.22,-1.22 0.8,1.02, body extent -0.8,-0.8 0.8,0.8, height 0.35
PCAP_8x5.4-ELECT_NCA [mil]
  rect 154x47 smd paste+0 mask+0: 1(-126,0) 2(126,0)
  silkscreen extent -222,-173 173,173, body extent -183,-167 183,160, height 219
"QFN-16 (3x3)" [mm] "QFN, 16-Leads, Body 3.00x3.00mm, Pitch 0.50mm, Thermal Pad 1.68x1.68mm, IPC Medium Density"
  oval 0.8x0.25 smd: 1(-1.45,0.75) 2(-1.45,0.25) 3(-1.45,-0.25) 4(-1.45,-0.75) 9(1.45,-0.75) 10(1.45,-0.25) 11(1.45,0.25) 12(1.45,0.75)
  oval 0.25x0.8 smd: 5(-0.75,-1.45) 6(-0.25,-1.45) 7(0.25,-1.45) 8(0.75,-1.45) 13(0.75,1.45) 14(0.25,1.45) 15(-0.25,1.45) 16(-0.75,1.45)
  rect 1.68x1.68 smd: 17(0,0)
  silkscreen extent -2.45,-1.7 1.7,1.7, body extent -1.55,-1.55 1.55,1.55, height 1
"QFN-56 RP2040" [mm] "QFN, 56-Leads, Body 7.00x7.00mm, Pitch 0.40mm, Thermal Pad 3.10x3.10mm, IPC Medium Density"
  oval 0.875x0.2 smd: 1(-3.437,2.6) 2(-3.437,2.2) 3(-3.437,1.8) 4(-3.437,1.4) 5(-3.437,1) 6(-3.437,0.6) 7(-3.437,0.2) 8(-3.437,-0.2) 9(-3.437,-0.6) 10(-3.437,-1) 11(-3.437,-1.4) 12(-3.437,-1.8) 13(-3.437,-2.2) 14(-3.437,-2.6) 29(3.437,-2.6) 30(3.437,-2.2) 31(3.437,-1.8) 32(3.437,-1.4) 33(3.437,-1) 34(3.437,-0.6) 35(3.437,-0.2) 36(3.437,0.2) 37(3.437,0.6) 38(3.437,1) 39(3.437,1.4) 40(3.437,1.8) 41(3.437,2.2) 42(3.437,2.6)
  oval 0.2x0.875 smd: 15(-2.6,-3.437) 16(-2.2,-3.437) 17(-1.8,-3.437) 18(-1.4,-3.437) 19(-1,-3.437) 20(-0.6,-3.437) 21(-0.2,-3.437) 22(0.2,-3.437) 23(0.6,-3.437) 24(1,-3.437) 25(1.4,-3.437) 26(1.8,-3.437) 27(2.2,-3.437) 28(2.6,-3.437) 43(2.6,3.437) 44(2.2,3.437) 45(1.8,3.437) 46(1.4,3.437) 47(1,3.437) 48(0.6,3.437) 49(0.2,3.437) 50(-0.2,3.437) 51(-0.6,3.437) 52(-1,3.437) 53(-1.4,3.437) 54(-1.8,3.437) 55(-2.2,3.437) 56(-2.6,3.437)
  rect 3.2x3.2 smd: 57(0,0)
  silkscreen extent -4.19,-3.65 3.65,3.65, body extent -3.52,-3.52 3.52,3.52, height 0.85
RESC1005X40X25NL05T10 [mm] "Chip Resistor, 2-Leads, Body 1.00x0.50mm, IPC Medium Density"
  rect 0.6x0.55 smd: 1(-0.425,0) 2(0.425,0)
  body extent -0.53,-0.27 0.53,0.28, height 0.4
RESC1609X50X30ML10T20 [mm] "Chip Resistor, 2-Leads, Body 1.55x0.85mm, IPC Low Density"
  rect 0.9x1.05 smd: 1(-0.675,0) 2(0.675,0)
  body extent -0.82,-0.48 0.82,0.48, height 0.5
RESISTOR_0402 [mm] "Resistor 0402"
  rect 0.55x0.75 smd: 1(-0.475,0) 2(0.475,0)
  silkscreen extent -1.02,-0.64 1.02,0.64, body extent -0.5,-0.25 0.5,0.25, height 0.25
RESISTOR_0603 [mil] "Resistor 0603"
  rect 40x45 smd: 1(-33.5,0) 2(33.5,0)
  silkscreen extent -65,-35 65,35, body extent -31,-16 32,16, height 16
RESISTOR_0805 [mm]
  rrect25% 1x1.42 smd: 1(-0.935,0) 2(0.935,0)
  silkscreen extent -1.91,-1.14 1.91,1.14, body extent -1.11,-0.67 1.1,0.67, height 0.61
RSN0032B-IPC_B [mm]
  rect 0.787x0.185 smd paste+0 mask+0: 1(-2.021,1.4)
  rect 0.85x0.192 smd paste+0 mask+0: 2(-1.99,1) 3(-1.99,0.6) 4(-1.99,0.2) 5(-1.99,-0.2) 6(-1.99,-0.6) 7(-1.99,-1) 18(1.99,-1) 19(1.99,-0.6) 20(1.99,-0.2) 21(1.99,0.2) 22(1.99,0.6) 23(1.99,1)
  rect 0.787x0.192 smd paste+0 mask+0: 8(-2.021,-1.4) 17(2.021,-1.4) 24(2.021,1.4)
  rect 0.192x0.787 smd paste+0 mask+0: 9(-1.4,-2.021) 16(1.4,-2.021) 25(1.4,2.021) 32(-1.4,2.021)
  rect 0.192x0.85 smd paste+0 mask+0: 10(-1,-1.99) 11(-0.6,-1.99) 12(-0.2,-1.99) 13(0.2,-1.99) 14(0.6,-1.99) 15(1,-1.99) 26(1,1.99) 27(0.6,1.99) 28(0.2,1.99) 29(-0.2,1.99) 30(-0.6,1.99) 31(-1,1.99)
  rect 2.85x2.85 smd paste-1.437 mask+0: 33(0,0)
  silkscreen extent -3.08,1.28 -2.83,1.52
SMASeries_LTF [mil]
  rect 86x65 smd paste+0 mask+0: 1(-67,0) 2(67,0)
  Top Layer keep-out region: -102,-53 -102,-34.5 102,-34.5 102,-53
  Top Layer keep-out region: -102,34.5 -102,53 102,53 102,34.5
  Top Layer keep-out region: -22,-34.5 -22,34.5 22,34.5 22,-34.5
  Keep-Out Layer region: -22,-34.5 -22,34.5 22,34.5 22,-34.5
  silkscreen extent -174,-60 109,60, body extent -104,-55 104,55, height 92
SMD_434123025826 [mm]
  rect 1.05x0.65 smd: A1(-2.075,1.075) A2(2.075,1.075) B1(-2.075,-1.075) B2(2.075,-1.075)
  silkscreen extent -2.1,-1.6 2.1,1.6, body extent -2.3,-1.6 2.3,1.6, height 2.5
SOIC-8 [mm] "SOIC, 8-Leads, Body 4.90x3.90mm, Pitch 1.27mm, IPC Medium Density"
  oval 1.45x0.6 smd: 1(-2.725,1.905) 2(-2.725,0.635) 3(-2.725,-0.635) 4(-2.725,-1.905) 5(2.725,-1.905) 6(2.725,-0.635) 7(2.725,0.635) 8(2.725,1.905)
  silkscreen extent -2.85,-2.5 1.6,2.88, body extent -3,-2.5 3,2.5, height 1.75
"SOIC-8 W25QxJV" [mm] "SOIC, 8-Leads, Body 5.28x5.28mm, Pitch 1.27mm, IPC Medium Density"
  oval 1.7x0.6 smd: 1(-3.55,1.905) 2(-3.55,0.635) 3(-3.55,-0.635) 4(-3.55,-1.905) 5(3.55,-1.905) 6(3.55,-0.635) 7(3.55,0.635) 8(3.55,1.905)
  silkscreen extent -3.67,-2.7 2.3,2.88, body extent -3.95,-2.62 3.95,2.62, height 1.95
SOIC-14 [mm] "SOIC, 14-Leads, Body 8.65x3.90mm, Pitch 1.27mm, IPC Medium Density"
  oval 1.45x0.6 smd: 1(-2.725,3.81) 2(-2.725,2.54) 3(-2.725,1.27) 4(-2.725,0) 5(-2.725,-1.27) 6(-2.725,-2.54) 7(-2.725,-3.81) 8(2.725,-3.81) 9(2.725,-2.54) 10(2.725,-1.27) 11(2.725,0) 12(2.725,1.27) 13(2.725,2.54) 14(2.725,3.81)
  silkscreen extent -2.85,-4.35 1.6,4.78, body extent -3,-4.4 3,4.4, height 1.7
SOT-23-3#1 [mil]
  rect 22x50 smd paste+0 mask+4: 1(-37.5,-41) 2(37.5,-41) 3(0,41)
  silkscreen extent -65,-32 65,32, body extent -60,-52 60,52, height 44
SOT-23-3#2 [mil]
  rect 22x50 smd paste+0 mask+4: 1(-37.5,41) 2(37.5,41) 3(0,-41)
  silkscreen extent -65,-33 65,33, body extent -60,-52 60,52, height 44
SPEAKER_SP-1609S [mm]
  rrect50% 2.2x1.1 smd: 1(8.255,-15.45) 2(8.255,-0.55)
  silkscreen extent 0,-16 9.02,0, body extent 0,-16 9,2.89
TC2030-MCP [mil]
  round 31 smd: 1(50,-25) 2(50,25) 3(100,-25) 4(100,25) 5(150,-25) 6(150,25)
  round 34 hole 35 unplated: A(0,0) B(200,40) C(200,-40)
  round 92 hole 93 unplated: D(0,-100) E(125,-100) F(0,100) G(125,100)
  silkscreen extent -55,-155 225,155
TENSILITY_54-00166 [mm]
  oval 3.6x1.4 hole 0.8 square mask+0.05: A(0,6.25) B(0,0)
  oval 1.4x3.6 hole 0.8 square mask+0.05: C(4.8,3.25)
  silkscreen extent -4.5,-5.1 4.5,7.55, body extent -4.5,-7.57 5,6.73, height 11
TQFN-16 [mil] "L"
  rect 32x10 smd paste+0 mask+0: 1(-57,29.53) 2(-57,9.84) 3(-57,-9.84) 4(-57,-29.53) 9(57,-29.53) 10(57,-9.84) 11(57,9.84) 12(57,29.53)
  rect 10x32 smd paste+0 mask+0: 5(-29.53,-57) 6(-9.84,-57) 7(9.84,-57) 8(29.53,-57) 13(29.53,57) 14(9.84,57) 15(-9.84,57) 16(-29.53,57)
  rect 49x49 smd paste+0 mask+0: 17(0,0)
  silkscreen extent -66,-66 93,66, body extent -61,-61 61,61, height 32
TRANS_AON6407 [mm]
  rect 0.65x0.5 smd: 1(-2.755,1.905) 2(-2.755,0.635) 3(-2.755,-0.635) 4(-2.755,-1.905)
  rect 0.5x0.5 smd paste-1 mask+0: 5_8(0.46,0)
  Top Layer region: 2.52,2.155 3.07,2.155 3.07,1.655 2.52,1.655 2.52,0.885 3.07,0.885 3.07,0.385 2.52,0.385 2.52,-0.385 3.07,-0.385 3.07,-0.885 2.52,-0.885 2.52,-1.655 3.07,-1.655 3.07,-2.155 2.52,-2.155 2.52,-2.3 -1.6,-2.3 -1.6,2.3 2.52,2.3
  silkscreen extent -3.85,-2.62 2.78,2.62, body extent -2.75,-3.03 2.75,3.03, height 0.95
TSOT-23_S6 [mil]
  rect 48x20 smd: 1(-45,37.4) 2(-45,0) 3(-45,-37.4) 4(45,-37.4) 5(45,0) 6(45,37.4)
  silkscreen extent -69,-62 40,65, body extent -55,-57 55,57, height 39

## Part data
C1: library part "CAP CER 0.01 UF 0402", "CAP CER 10000PF 50V X7R 0402", Capacitance="10 nF", Manufacturer=YAGEO, Package=CC0402, Supplier Part Number 1=8570871, Temperature="-55°C to +125°C", Temperature Characteristic=X7R, Temperature Coefficient=30ppm/°C, Temperature Range High=+125°C, Temperature Range Low=-55°C, Tolerance=0.1, Voltage Rating="50 V", Automotive=No, Automotive Grade=NA, Category=Cap, ComponentLink2Description=Datasheet, ComponentLink2URL=http://www.yageo.com/documents/recent/UPY-GP_NP0_16V-to-50V_16.pdf, Device Class L1="Passive Components", Device Class L2=Capacitors, Device Class L3="Ceramic Capacitors", Digikey Description="CAP CER 10000PF 50V X7R 0402", Footprint Url=http://www.yageo.com/exep/pages/download/literatures/UPY-C_GEN_24.pdf, Height=0.55mm, Ipc Land Pattern Name=CAPC10050X50, Lead Free=Yes, Manufacturer Part Number=CC0402KRX7R9BB103, Material=Ceramic, Mouser Description="0402 10 nF 50 V ±10 % Tolerance X7R SMT Multilayer Ceramic Capacitor", Octopart=https://octopart.com/cc0402krx7r9bb103-yageo-8376513, RoHS=TRUE, Supplier 1="Future Electronics"
C1C C3C C3R C4C C5R C6R C7R C8R C9R C10R C12R C13R: library part CAPACITOR_0.1uF_0402, "Cap 100nF 25V +/-10% / Ceramic 0402", Supplier Part Number 1=478-7868-1-ND, Tolerance="+/- 10%", Voltage=25V, Made By="Robert Pafford", Supplier 1=Digi-Key
C1R C2R: library part CAPACITOR_0.000027uF_0402, "Cap 27pF 50V +/-5% / Ceramic 0402", Supplier Part Number 1=445-5589-1-ND, Tolerance="+/- 5%", Voltage=50V, Made By="Robert Pafford", Supplier 1=Digi-Key
C2C: library part CAPACITOR_0.0047uF_0402, "4700 pF +/-10% 25V Ceramic Capacitor X7R 0402", Supplier Part Number 1=478-6195-1-ND, Tolerance="+/- 10%", Voltage=25V, Made By="Robert Pafford", Supplier 1=Digi-Key
C3: library part CAPACITOR_0.000015uF_0402, "CAP CER 15PF 50V C0G/NP0 0402", Supplier Part Number 1=82AC9245, Tolerance="+/- 5%", Voltage=50V, Made By="Robert Pafford", Supplier 1=Newark
C4: library part CAPACITOR_0.0012uF_0402, "CAP CER 1200PF 50V X7R 0402", Supplier Part Number 1=5334081, Tolerance="+/- 5%", Voltage=50V, Made By="Robert Pafford", Supplier 1="Future Electronics"
C4R C5C C11R: library part CAPACITOR_1uF_0402, "Cap 1uF 16V +/-10% / Ceramic 0402", Supplier Part Number 1=478-0402YD105KAT4ADKR-ND, Tolerance="+/- 10%", Voltage=16V, Made By="Robert Pafford", Supplier 1=Digi-Key
C5: library part CAPACITOR_0.0033uF_0402, "CAP CER 3300PF 50V X7R 0402", Supplier Part Number 1=CL05B332KB5NNNC, Tolerance="+/- 5%", Voltage=50V, Made By="Robert Pafford", Supplier 1="Arrow Electronics"
C6: library part CAPACITOR_0.000033uF_0402, "CAP CER 33PF 50V C0G/NP0 0402", Supplier Part Number 1=82AC9259, Tolerance="+/- 5%", Voltage=50V, Made By="Robert Pafford", Supplier 1=Newark
C7: library part CAPACITOR_2.2uF_0402, "Cap 2.2uF 35V +/-10% / Ceramic 0402", Supplier Part Number 1=445-9028-1-ND, Tolerance="+/- 10%", Voltage=35V, Made By="Flip B", Supplier 1=Digi-Key
C8 C10: library part CAPACITOR_0.0001uF_0603, "CAP CER 100PF 50V C0G/NP0 0603", Supplier Part Number 1=CL10C101JB8NNNC, Tolerance="+/- 5%", Voltage=50V, Made By="Robert Pafford", Supplier 1="Arrow Electronics"
C9 C47: library part CAPACITOR_1uF_0603, "Cap 1uF 16V +/-10% / Ceramic 0603", Supplier Part Number 1=C1608X7R1C105K080AC, Tolerance="+/- 10%", Voltage=16V, Made By="Flip B", Supplier 1="Arrow Electronics"
C11 C45 C46: library part CAPACITOR_0.022uF_0402, "Cap 22nF 25V +/-10% / Ceramic 0402", Supplier Part Number 1=445-1261-1-ND, Tolerance="+/- 10%", Voltage=25V, Made By="Robert Pafford", Supplier 1=Digi-Key
C12: library part CAPACITOR_0.1uF_0603_25V, "Cap 100nF 25V +/-10% / Ceramic 0603", Supplier Part Number 1=1276-1006-1-ND, Tolerance="+/- 10%", Voltage=6.3V, ComponentLink1Description=Datsheet, ComponentLink1URL=https://www.mouser.com/datasheet/2/212/KEM_C1002_X7R_SMD-1102033.pdf, Made By="Flip B", Supplier 1=Digikey
C13 C59 C60: library part "CAP ALUM 22UF 20% 35V SMD", "22 µF 35 V Aluminum Electrolytic Capacitors Radial, Can - SMD 1000 Hrs", Supplier Part Number 1=PCE3952DKR-ND, Voltage=35V, Made By="Robert Pafford", Supplier 1=Digi-Key
C14 C61: library part "CAP ALUM 10UF 20% 63V SMD", "10 µF 63 V Aluminum - Polymer Capacitors Radial, Can SMD 120mOhm", Max Voltage=63V, Supplier Part Number 1=P15466CT-ND, Tolerance="+/- 20%", Made By="Robert Pafford", Supplier 1=Digi-Key
C15 C25 C26: library part CAPACITOR_10uF_1206, "Cap 10uF 25V +/-10% / Ceramic 1206", Supplier Part Number 1=1276-1804-6-ND, Tolerance="+/- 10%", Value (uF)="10 uF", Voltage=25V, Made By="Robert Pafford", Supplier 1=Digi-Key
C16 C17: library part CAPACITOR_22uF_0805, "Cap 22uF 10V +/-20% X5R / Ceramic 0805", Supplier Part Number 1=445-7665-6-ND, Tolerance="+/- 20%", Voltage=10V, Made By="Robert Pafford", Supplier 1=Digi-Key
C18: library part CMP-2100-03592-2, "CAP CER 10000PF 50V X7R 0402", Capacitance="10 nF", Manufacturer=YAGEO, Package=CC0402, Temperature="-55°C to +125°C", Temperature Characteristic=X7R, Temperature Coefficient=30ppm/°C, Temperature Range High=+125°C, Temperature Range Low=-55°C, Tolerance=0.1, Voltage Rating="50 V", Automotive=No, Automotive Grade=NA, Category=Cap, ComponentLink2Description=Datasheet, ComponentLink2URL=http://www.yageo.com/documents/recent/UPY-GP_NP0_16V-to-50V_16.pdf, Device Class L1="Passive Components", Device Class L2=Capacitors, Device Class L3="Ceramic Capacitors", Digikey Description="CAP CER 10000PF 50V X7R 0402", Footprint Url=http://www.yageo.com/exep/pages/download/literatures/UPY-C_GEN_24.pdf, Height=0.55mm, Ipc Land Pattern Name=CAPC10050X50, Lead Free=Yes, Manufacturer Part Number=CC0402KRX7R9BB103, Material=Ceramic, Mouser Description="0402 10 nF 50 V ±10 % Tolerance X7R SMT Multilayer Ceramic Capacitor", Octopart=https://octopart.com/cc0402krx7r9bb103-yageo-8376513, RoHS=TRUE
C19 C20: library part CMP-04424-000506-1, "22uF 35V  ±10% 900mΩ 2917  SMD Tantalum Capacitor", Capacitance=22uF, Case Code (Imperial)=2917, Case Code (Metric)=7343, Dielectric Material=Tantalum, ESR (Equivalent Series Resistance)=900mR, Leakage Current=7.7uA, Max Operating Temperature=125°C, Min Operating Temperature=-55°C, Package Quantity=1, Tolerance=10%, Voltage=35V, Case/Package=2917, Construction=Flat, Depth=4.3mm, Dissipation Factor=6%, Features="General Purpose", Height=2.9mm, Height - Seated (Max)=0.122inch, Lead Free="Lead Free", Length=7.3mm, Mount="Surface Mount", Number of Pins=2, Packaging="Tape and Reel", Polarity=Polar, Radiation Hardening=No, REACH SVHC="No SVHC", RoHS Compliant=Yes, Series=TAJ, Termination=SMD/SMT, Voltage Rating=35V, Voltage Rating (DC)=35V, Width=4.3mm
C21 C23 C67 C68: library part CAPACITOR_0.01uF_0603_50V, "10000 pF ±10% 50V Ceramic Capacitor X7R 0603 (1608 Metric)", Tolerance="+/- 10%", Voltage=6.3V, ComponentLink1Description=Datsheet, ComponentLink1URL=https://www.mouser.com/datasheet/2/212/KEM_C1002_X7R_SMD-1102033.pdf, Made By="Flip B", Supplier 1="Arrow Electronics", Supplier Part Number 1=CL10B103KB8NNNC
C22: library part CMP-2008-03295-2, "CAP CER 1000PF 50V 5% NP0 0402", Capacitance="1,000 pF", Manufacturer=Kemet, Package=C0402-BB, Temperature="-55°C to +125°C", Temperature Characteristic=C0G, Temperature Coefficient=15%, Temperature Range High=+125°C, Temperature Range Low=-55°C, Tolerance=0.05, Voltage Rating="50 V", Automotive=No, Category=Cap, ComponentLink2Description=Datasheet, ComponentLink2URL=https://content.kemet.com/datasheets/KEM_C1002_X7R_SMD.pdf, Device Class L1="Passive Components", Device Class L2=Capacitors, Device Class L3="Ceramic Capacitors", Digikey Description="CAP CER 1000PF 50V 5% NP0 0402", Height=0.55mm, Ipc Land Pattern Name=CAPC10050X50, Lead Free=Yes, Manufacturer Part Number=C0402C102J5GACTU, Material=Ceramic, Mouser Description="Cap Ceramic 0.001uF 50V C0G 5% SMD 0402 125°C Paper T/R", Octopart=https://octopart.com/c0402c102j5gactu-kemet-9145103, RoHS=TRUE
C24 C29 C30 C31 C32 C33 C34 C35 C36 C37 C38 C39 C40 C41 C42: library part CMP-2000-06048-2, "Multilayer Ceramic Capacitors 10uF ±20% 35V X7R SMD 1206", Capacitance=10uF, Case Code (Imperial)=1206, Case Code (Metric)=3216, Dielectric=X7R, Dielectric Material=Ceramic, Max Operating Temperature=125°C, Min Operating Temperature=-55°C, Package Quantity=2000, Tolerance=20%, Voltage Rating=35V, Case/Package=1206, Construction=Flat, Depth=1.6mm, Height=1.6mm, Lead Free="Lead Free", Length=3.2mm, Mount="Surface Mount", Packaging="Tape and Reel", REACH SVHC="No SVHC", Resistor Type=Ceramic, RoHS Compliant=Yes, Series=C, Termination=SMD/SMT, Thickness=0.071inch, Voltage Rating (DC)=35V, Weight=0.000571oz, Width=0.063inch
C27 C28: library part CMP-2006-02927-1, Manufacturer=Murata, Part Number=GRM188R71H473KA61D
C43: library part CAPACITOR_0.1uF_0603_1, "Chip Multilayer Ceramic Capacitors for General Purpose, 0201, 0.10uF, X5R, 15%, 20%, 35V", Capacitance=100nF, Case Code (Imperial)=0201, Case Code (Metric)=0603, Dielectric=X5R, Max Operating Temperature=85°C, Min Operating Temperature=-55°C, Package Quantity=15000, Tolerance=20%, Voltage Rating=35V, Case/Package=0201, Height=0.3mm, Length=0.024inch, Mount="Surface Mount", Packaging="Tape and Reel", Supplier 1="Arrow Electronics", Supplier Part Number 1=GRM033R6YA104ME14D, Termination=SMD/SMT, Thickness=0.013inch, Voltage Rating (DC)=35V, Weight=1.2E-05oz, Width=0.012inch
C44: library part CMP-2000-07531-4, "Ceramic Capacitor General Use 1uF ±10% 50V X7R 0603", Capacitance=1uF, Case Code (Imperial)=0603, Case Code (Metric)=1608, Dielectric=X7R, Max Operating Temperature=125°C, Min Operating Temperature=-55°C, Package Quantity=1, Tolerance=10%, Voltage Rating=50V, Case/Package=0603, Construction=Flat, Depth=0.8mm, Halogen Free="Halogen Free", Height=0.8mm, Length=1.6mm, Mount="Surface Mount", Packaging="Tape and Reel", Radiation Hardening=No, RoHS Compliant=Yes, Series=M, Termination=SMD/SMT, Thickness=0.037inch, Voltage Rating (DC)=50V, Width=0.031inch
C48: library part CAPACITOR_4.7uF_0603, "Cap 4.7uF 6.3V +/-10% / Ceramic 0603", Supplier Part Number 1=1276-2087-1-ND, Tolerance="+/- 10%", Voltage=6.3V, Made By="Robert Pafford", Supplier 1=Digi-Key
C49 C50 C51 C52: library part CAPACITOR_0.01uF_0603, "Cap 10nF 6.3V +/-20% / Ceramic 0603", Supplier Part Number 1=80-C0603C103K9R, Tolerance="+/- 10%", Voltage=6.3V, ComponentLink1Description=Datsheet, ComponentLink1URL=https://www.mouser.com/datasheet/2/212/KEM_C1002_X7R_SMD-1102033.pdf, Made By="Flip B", Supplier 1=Mouser
C53 C54 C55: library part CAPACITOR_100uF_0603, "Cap 100uF 6.3V +/-20% / Ceramic 0603", Supplier Part Number 1=6911206, Tolerance="+/- 20%", Value (uF)="100 uF", Voltage=6.3V, ComponentLink1Description=Digikey, ComponentLink1URL=https://www.digikey.com/en/products/detail/samsung-electro-mechanics/CL10A106MQ8NNNC/3886777, Made By="Dylan Trainor", Supplier 1=RSComponents
C56 C62 C63 C64: library part CAPACITOR_10uF_0603, "Cap 10uF 6.3V +/-20% / Ceramic 0603", Supplier Part Number 1=1276-1119-1-ND, Tolerance="+/- 20%", Value (uF)="10 uF", Voltage=6.3V, ComponentLink1Description=Digikey, ComponentLink1URL=https://www.digikey.com/en/products/detail/samsung-electro-mechanics/CL10A106MQ8NNNC/3886777, Made By="Flip B", Supplier 1=Digi-Key
C57 C58: library part CAPACITOR_0.00033uF_0603, "Cap 330pF 16V +/-5% / Ceramic 0603", Supplier Part Number 1=732-7769-1-ND, Tolerance="+/- 5%", Voltage=16V, ComponentLink1Description=Datsheet, ComponentLink1URL=https://www.we-online.de/katalog/datasheet/885012006026.pdf, Made By="Flip B", Supplier 1=Digi-Key
CR1: library part TVS_SMAJ26CA, "TVS DIODE 26VWM 42.1VC DO214AC", Mfr_Name="Littelfuse Inc", Copyright="Copyright (C) 2024 Ultra Librarian. All rights reserved.", Manufacturer_Part_Number=SMAJ26CA, RefDes=RefDes, Type=DEV
CR2: library part CMP-08607-000106-1, "TVS DIODE 22V 35.5V DO214AC", Breakdown Voltage=24.4V, Clamping Voltage=35.5V, Leakage Current=1uA, Max Breakdown Voltage=26.9V, Max Operating Temperature=150°C, Max Power Dissipation=3.3W, Max Surge Current=11.3A, Min Operating Temperature=-65°C, Operating Supply Voltage=22V, Package Quantity=5000, Peak Pulse Power=400W, Power Line Protection=No, Test Current=1mA, Composition=Zener, Direction=Bidirectional, Height=2.29mm, Lead Free="Lead Free", Length=5.28mm, Min Breakdown Voltage=24.4V, Mount="Surface Mount", Number of Bidirectional Channels=1, Number of Channels=1, Number of Elements=1, Number of Pins=2, Packaging="Tape and Reel", Peak Pulse Current=11.3A, Polarity=Bidirectional, Power Dissipation=400W, Reverse Breakdown Voltage=24.4V, Reverse Standoff Voltage=22V, Termination=SMD/SMT, Voltage Rating (DC)=22V, Width=2.79mm
D1C: library part LED_RGB_4SMD, "LED RGB CLEAR 4SMD", Blue Forward Current=5mA, Blue Forward Voltage=2.8V, Color=RGB, Package=4-SMD, Red Forward Voltage=1.8V, Supplier Part Number 1=1080-1552-1-ND, ComponentLink1Description=Datasheet, ComponentLink1URL=https://everlightamericas.com/index.php?controller=attachment&id_attachment=3220, Green Forward Current=5mA, Green Forward Voltage=2.8V, Made By="Robert Pafford", Red Forward Current=5mA, Supplier 1=Digi-Key
F1: library part ERB-RE5R00V, "Pansonic", Breaking Capacity=150A, Current Rating=5A, Mfr_Name=Panasonic, Package=1206, Supplier Part Number 1=P15125CT-ND, Voltage Rating=32V, Created By="Robert Pafford", Manufacturer_Part_Number=ERB-RE5R00V, Response Time="Fast Blow", Supplier 1=Digi-Key
J1: library part CONN_USBC_CMP-04767-000028-1, "CONN RCP USB2.0 TYP C 24P SMD RA", Created By="James Mills"
J1R: library part TC2030_SWD, "TagConnect TC2030 ARM SWD 6-pin"
J2: library part "CONN_MOLEX_MINIFIT JR_6POS_R/A", "Molex Minifit Jr. 5569  / 6 Pos R/A Natural", Color=Natural, Current Per Pin=13A, Manufacturer=Molex, Supplier Part Number 1=WM1353-ND, ComponentLink1Description=Datasheet, ComponentLink1URL=https://www.molex.com/pdm_docs/ps/PS-5556-001.pdf, Configuration="Right Angle", Created By="Flip B", Number of Positions=8, Pitch=4.2mm, Series="Minifit Jr 5569", Supplier 1=Digi-Key
J3: "50 pins 0.5 Pitch SMD Horizontal Type Top Contact", Max Current=?, Supplier Part Number 1=HFK116CT-ND, Contact Plating="Phosphor Bronze, Tin/Lead Plated", FFC Type="ZIF Locking", Made By="Andrew Lin", Orientation="Horizontal Top", Pin Count=50, Supplier 1=Digi-Key
J4: "Connector, dc jack 5.5x2.1 mm, PCB mount, 90 degrees, nickel plated, PBT, thru hole", Package=None, Supplier Part Number 1=839-54-00166-ND, Availability="In Stock", Check_prices=https://www.snapeda.com/parts/54-00166/Tensility+International+Corp/view-part/?ref=eda, MF="Tensility International Corp", MP=54-00166, Price=None, Purchase-URL=https://pricing.snapeda.com/search?q=54-00166&ref=eda, SnapEDA_Link=https://www.snapeda.com/parts/54-00166/Tensility+International+Corp/view-part/?ref=snap, Supplier 1=Digi-Key
J5: library part HEADER_2PIN_2.54MM, "CONN HEADER VERT 2POS 2.54MM", Color=Natural, Current Per Pin=1A, Supplier Part Number 1=A121480-ND, ComponentLink1Description=Datasheet, ComponentLink1URL=https://www.molex.com/pdm_docs/sd/026013115_sd.pdf, Configuration=Vertical, Created By="Robert P", Number of Positions=2, Pitch=2.54mm, Supplier 1=Digi-Key, Supplier 2=Mouser, Supplier Part Number 2=571-5-146280-2
J6 J7: library part CONN_JST_XH254_2POS_VERT, "JST XH 2.54mm Pitch 2 Pos Vertical", Color=White, Current Per Pin=4A, Manufacturer=JST, ComponentLink1Description="Purchase Link", ComponentLink1URL=https://www.amazon.com/460PCS-XH2-54-Connector-Terminal-Connectors/dp/B09DBGVX5C, Configuration=Vertical, Created By="Robert P", NOTE="Do not use JST 2.5mm parts with this footprint. JST does not make 2.54mm pitch pins, rather only clones make this connector!", Number of Positions=2, Pitch=2.54mm, Series="XH 2.54"
L1: "8 Ohms General Purpose Speaker 700 mW 200 Hz ~ 5 kHz Top Rectangular", Supplier Part Number 1=433-1132-ND, Supplier 1=Digi-Key
L2: library part INDUCTOR_4.7uH_SLF7045T, "4.7 µH Shielded Drum Core, Wirewound Inductor 2.1 A 36mOhm Max Nonstandard", Current Rating=2.1A, DC Resistance=36mOhm, Supplier Part Number 1=587-2617-1-ND, Tolerance="+/- 20%", Made By="Robert Pafford", Supplier 1=Digi-Key
L3: library part INDUCTOR_3.3uH_SRP1770TA_3R3M, "3.3 µH Shielded Drum Core, Wirewound Inductor 28 A 3.9mOhm Max Nonstandard", Manufacturer_Part_Number=SRP1265C-4R7M, Mfr_Name="Bourns Electronics", Supplier Part Number 1=58Y3764, Copyright="Copyright (C) 2023 Ultra Librarian. All rights reserved.", RefDes=RefDes, Supplier 1=Newark, Type=DEV
Q1 Q2: "P-Channel 30V 4.3A (Ta) 1.38W (Ta) Surface Mount SOT23", Supplier Part Number 1=DMP3056L-7DICT-ND, Created By="John Ulm", Id=-4.3A, Reviewed By=---, Supplier 1=Digi-Key, VDSS (Max)=-30V, Vgss (Max)=+-25V
Q3: "P-Channel 30V 32A (Ta), 85A (Tc) 7.3W (Ta), 83W (Tc) Surface Mount 8-DFN (5x6)", Package="DFN-8 Alpha &amp; Omega Semiconductor", Check_prices=https://www.snapeda.com/parts/AON6407/Alpha%20&%20Omega%20Semiconductor%20Inc./view-part/2658357/?ref=eda, Digi-Key_Part_Number=785-1421-1-ND, MF="Alpha &", MP=AON6407, SnapEDA_Link=https://www.snapeda.com/parts/AON6407/Alpha%20&%20Omega%20Semiconductor%20Inc./view-part/2658357/?ref=snap
Q4: library part AO3404A, "N-Channel 30 V 5.8A (Ta) 1.4W (Ta) Surface Mount SOT-23-3", Amp Rating="5.8 A", Package=SOT23-3L, Power Dissipation="1.4W (Ta)", Supplier Part Number 1=785-1004-1-ND, Created By="Dylan T", FET Type=N-Channel, Manufacturer _Part_Number=AO3404A, Rds (on)="28mOhm @ 5.8A, 10V", SourceLibrary=ON_Semiconductor_2020-01-13, Supplier 1=Digi-Key, Vdss=30V, Vendor="Alpha & Omega Semiconductor Inc.", Vgs (Max)="3V @ 5.8A, 10V", Vgs (th)="3V @ 250µA"
R1C R4C R4R R5R R6C R30: library part RESISTOR_10K_0402, "RES 10k OHM 1% 1/16W 0402", Digikey Part Numer=CR0603-JW-104ELFTR-ND, Supplier Part Number 1=YAG3436CT-ND, Tolerance="+/- 1%", Value  (Ohms)=10K, Made By="Robert Pafford", Supplier=Digikey, Supplier 1=Digi-Key, Wattage=1/16W
R1R R6R R7R: library part RESISTOR_1K_0402, "RES 1k OHM 1% 1/16W 0402", Digikey Part Numer=CR0603-JW-104ELFTR-ND, Supplier Part Number 1=13-AC0402FR-131KLCT-ND, Tolerance="+/- 1%", Value  (Ohms)=1K, Made By="Robert Pafford", Supplier=Digikey, Supplier 1=Digi-Key, Wattage=1/16W
R2: library part RESISTOR_1K_0603, "RES 1k OHM 5% 1/8W 0603", Digikey Part Numer=CR0603-JW-104ELFTR-ND, Supplier Part Number 1=2019-RK73B1JTTD102JCT-ND, Tolerance="+/- 5%", Value  (Ohms)=1K, ComponentLink1Description=Datasheet, ComponentLink1URL=https://www.bourns.com/docs/product-datasheets/CRxxxxx.pdf, Made By="Robert Pafford", Supplier=Digikey, Supplier 1=Digi-Key, Wattage=1/8W
R2C R3C: library part RESISTOR_60.4_0402, "RES 60.4 OHM 1% 1/16W 0402", Digikey Part Numer=CR0603-JW-104ELFTR-ND, Supplier Part Number 1=13-AC0402FR-0760R4LCT-ND, Tolerance="+/- 1%", Value  (Ohms)=60.4, Made By="Robert Pafford", Supplier=Digikey, Supplier 1=Digi-Key, Wattage=1/16W
R2R R3R: library part RESISTOR_27_0402, "RES 27 OHM 1% 1/16W 0402", Digikey Part Numer=CR0603-JW-104ELFTR-ND, Supplier Part Number 1=YAG5278DKR-ND, Tolerance="+/- 1%", Value  (Ohms)=27, Made By="Robert Pafford", Supplier=Digikey, Supplier 1=Digi-Key, Wattage=1/16W